# Altium PCB MainBoardPCB_PWR.PcbDoc (part 1 of 29)
Units mm, origin at the board's own origin, x right, y up, seen from the top; angles counter-clockwise.
Board outline 333.63 x 349.38 mm, 16 copper layers (L1, L2 (GND), L3 (Sign), L4 (GND), L5 (Sign), L6 (PWR/GND), L7(PWR/GND), L8 (PWR/GND), L9 (PWR/GND), L10 (PWR/GND), L11 (PWR/GND), L12 (Sign), L13 (GND), L14 (Sign), L15 (GND), L16), stack 2.503 mm thick; 2187 components, 1615 nets, 7987 pads, 1695 vias.
Unrouted connection lines stored in the file: 4757.
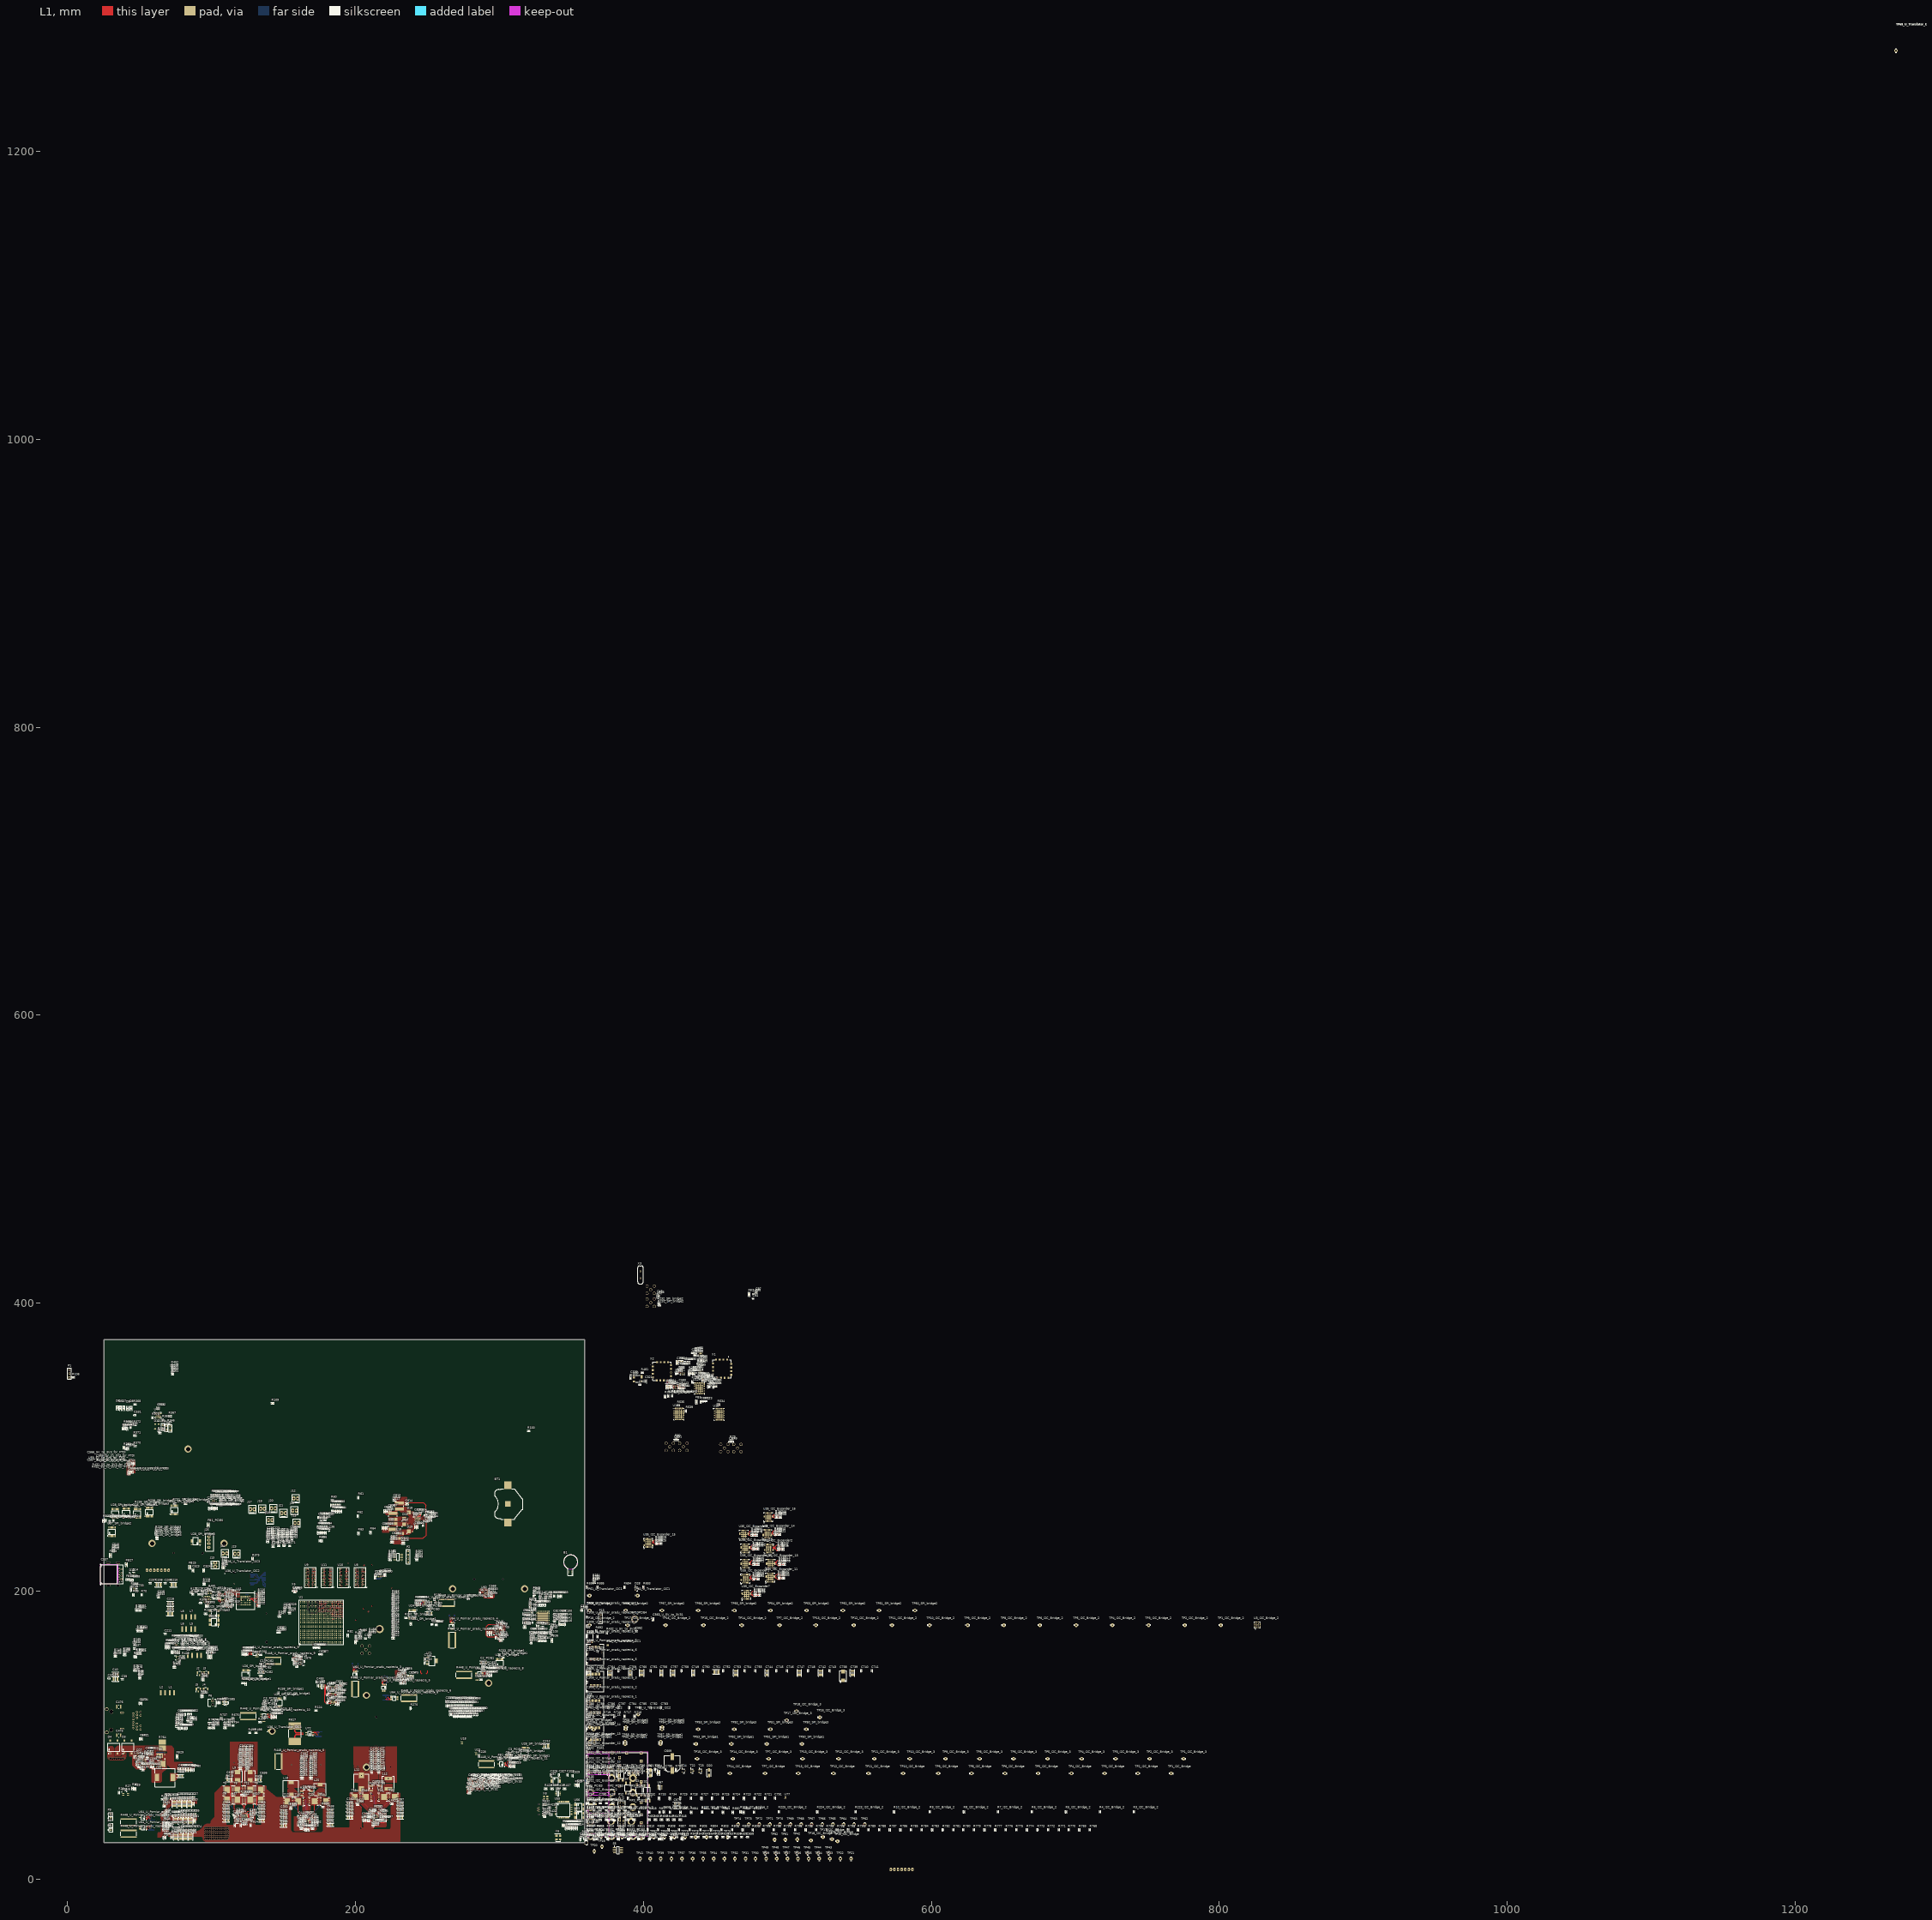
[diagram p0: L1 view]
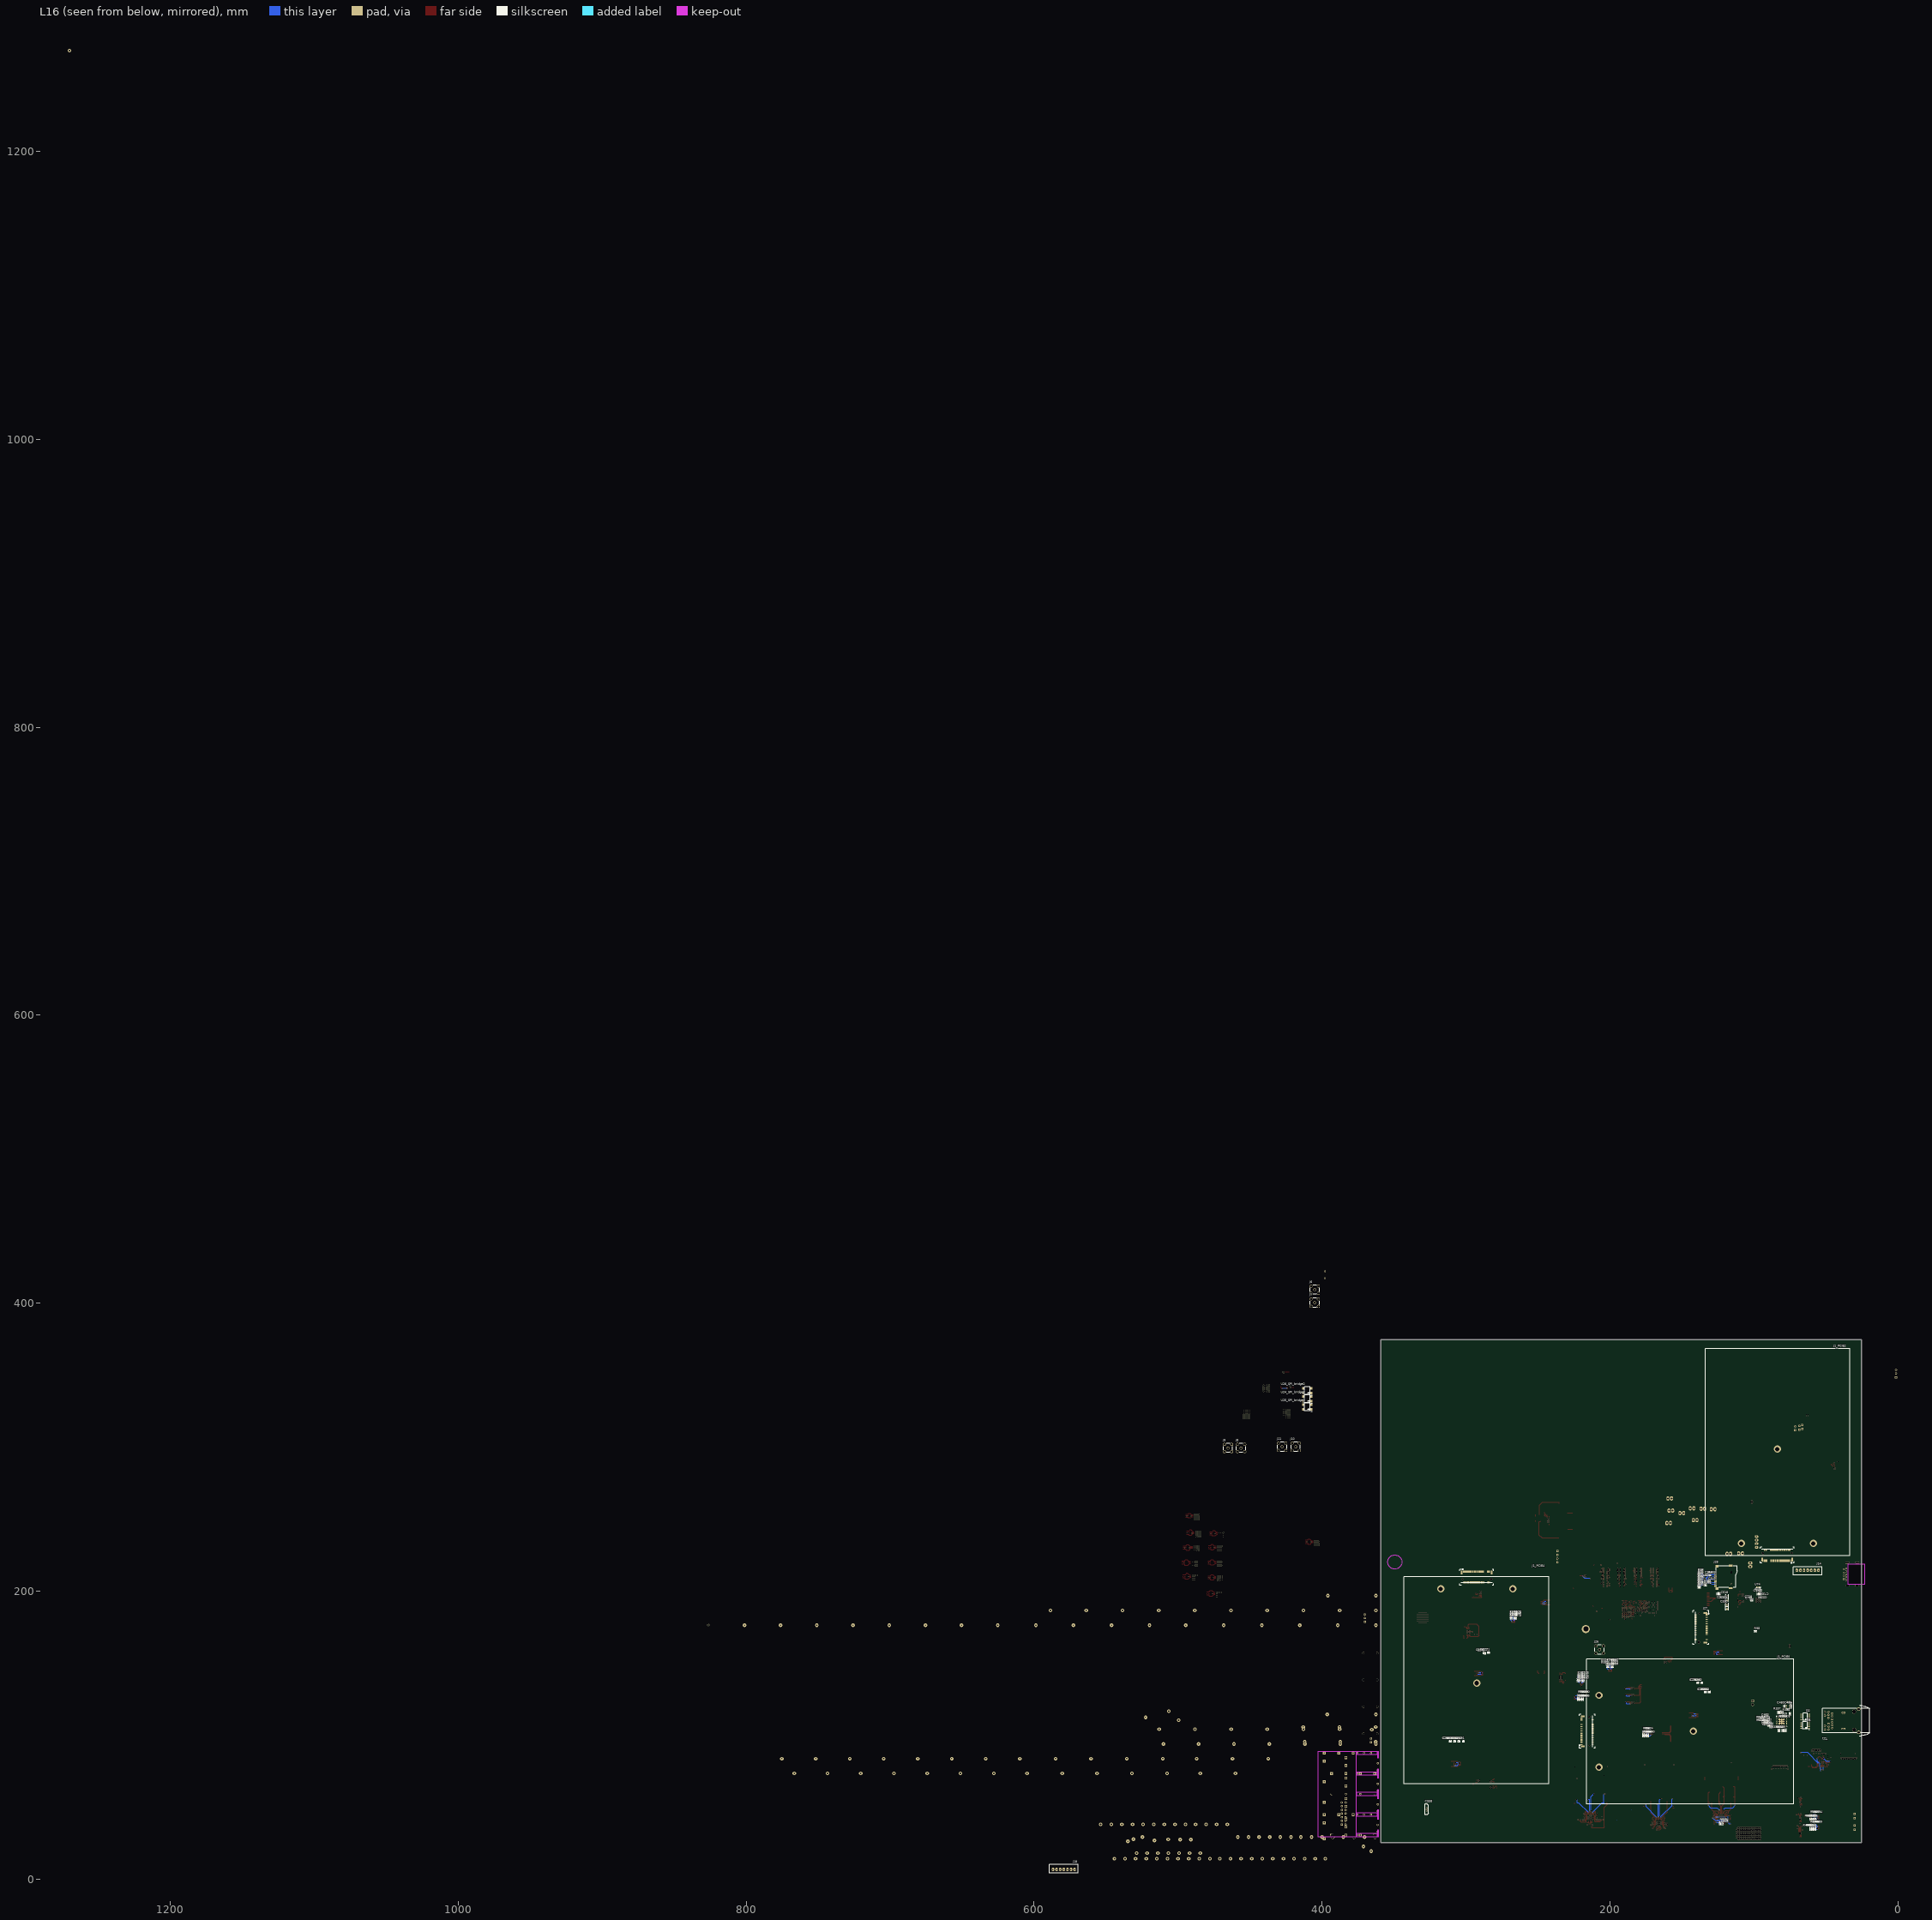
[diagram p1: L16 view, seen from below]
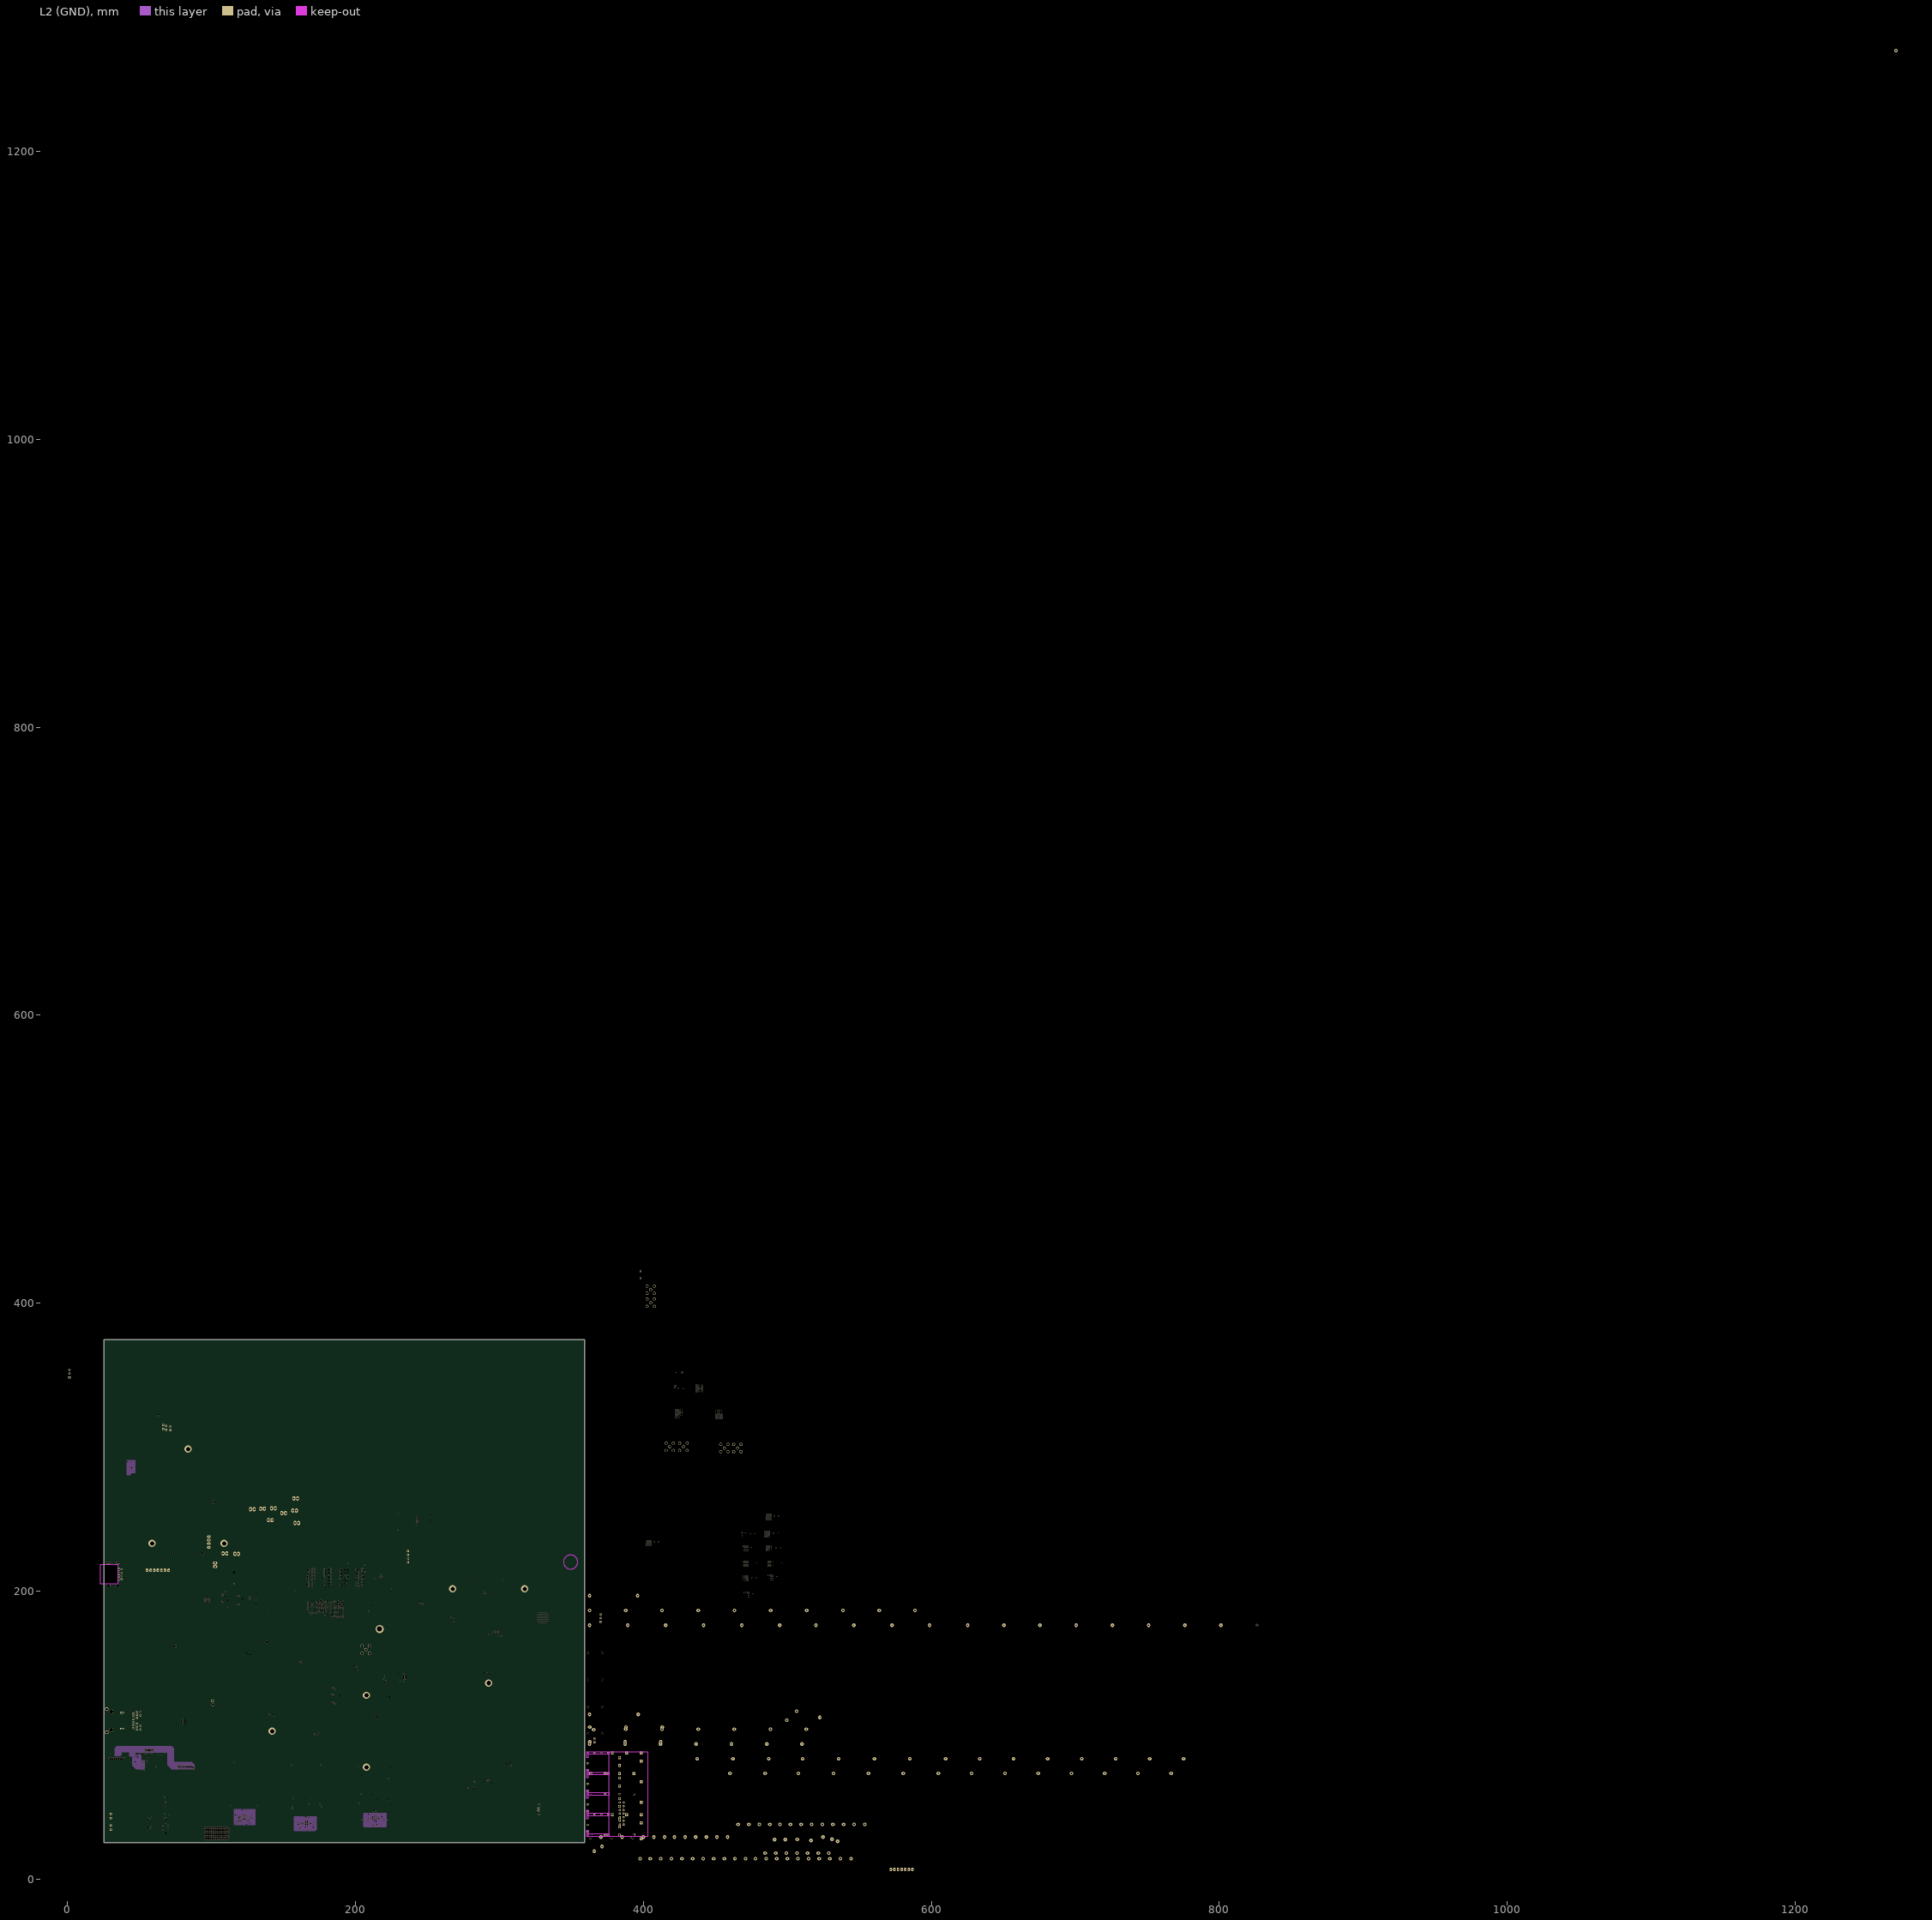
[diagram p2: L2 (GND)]
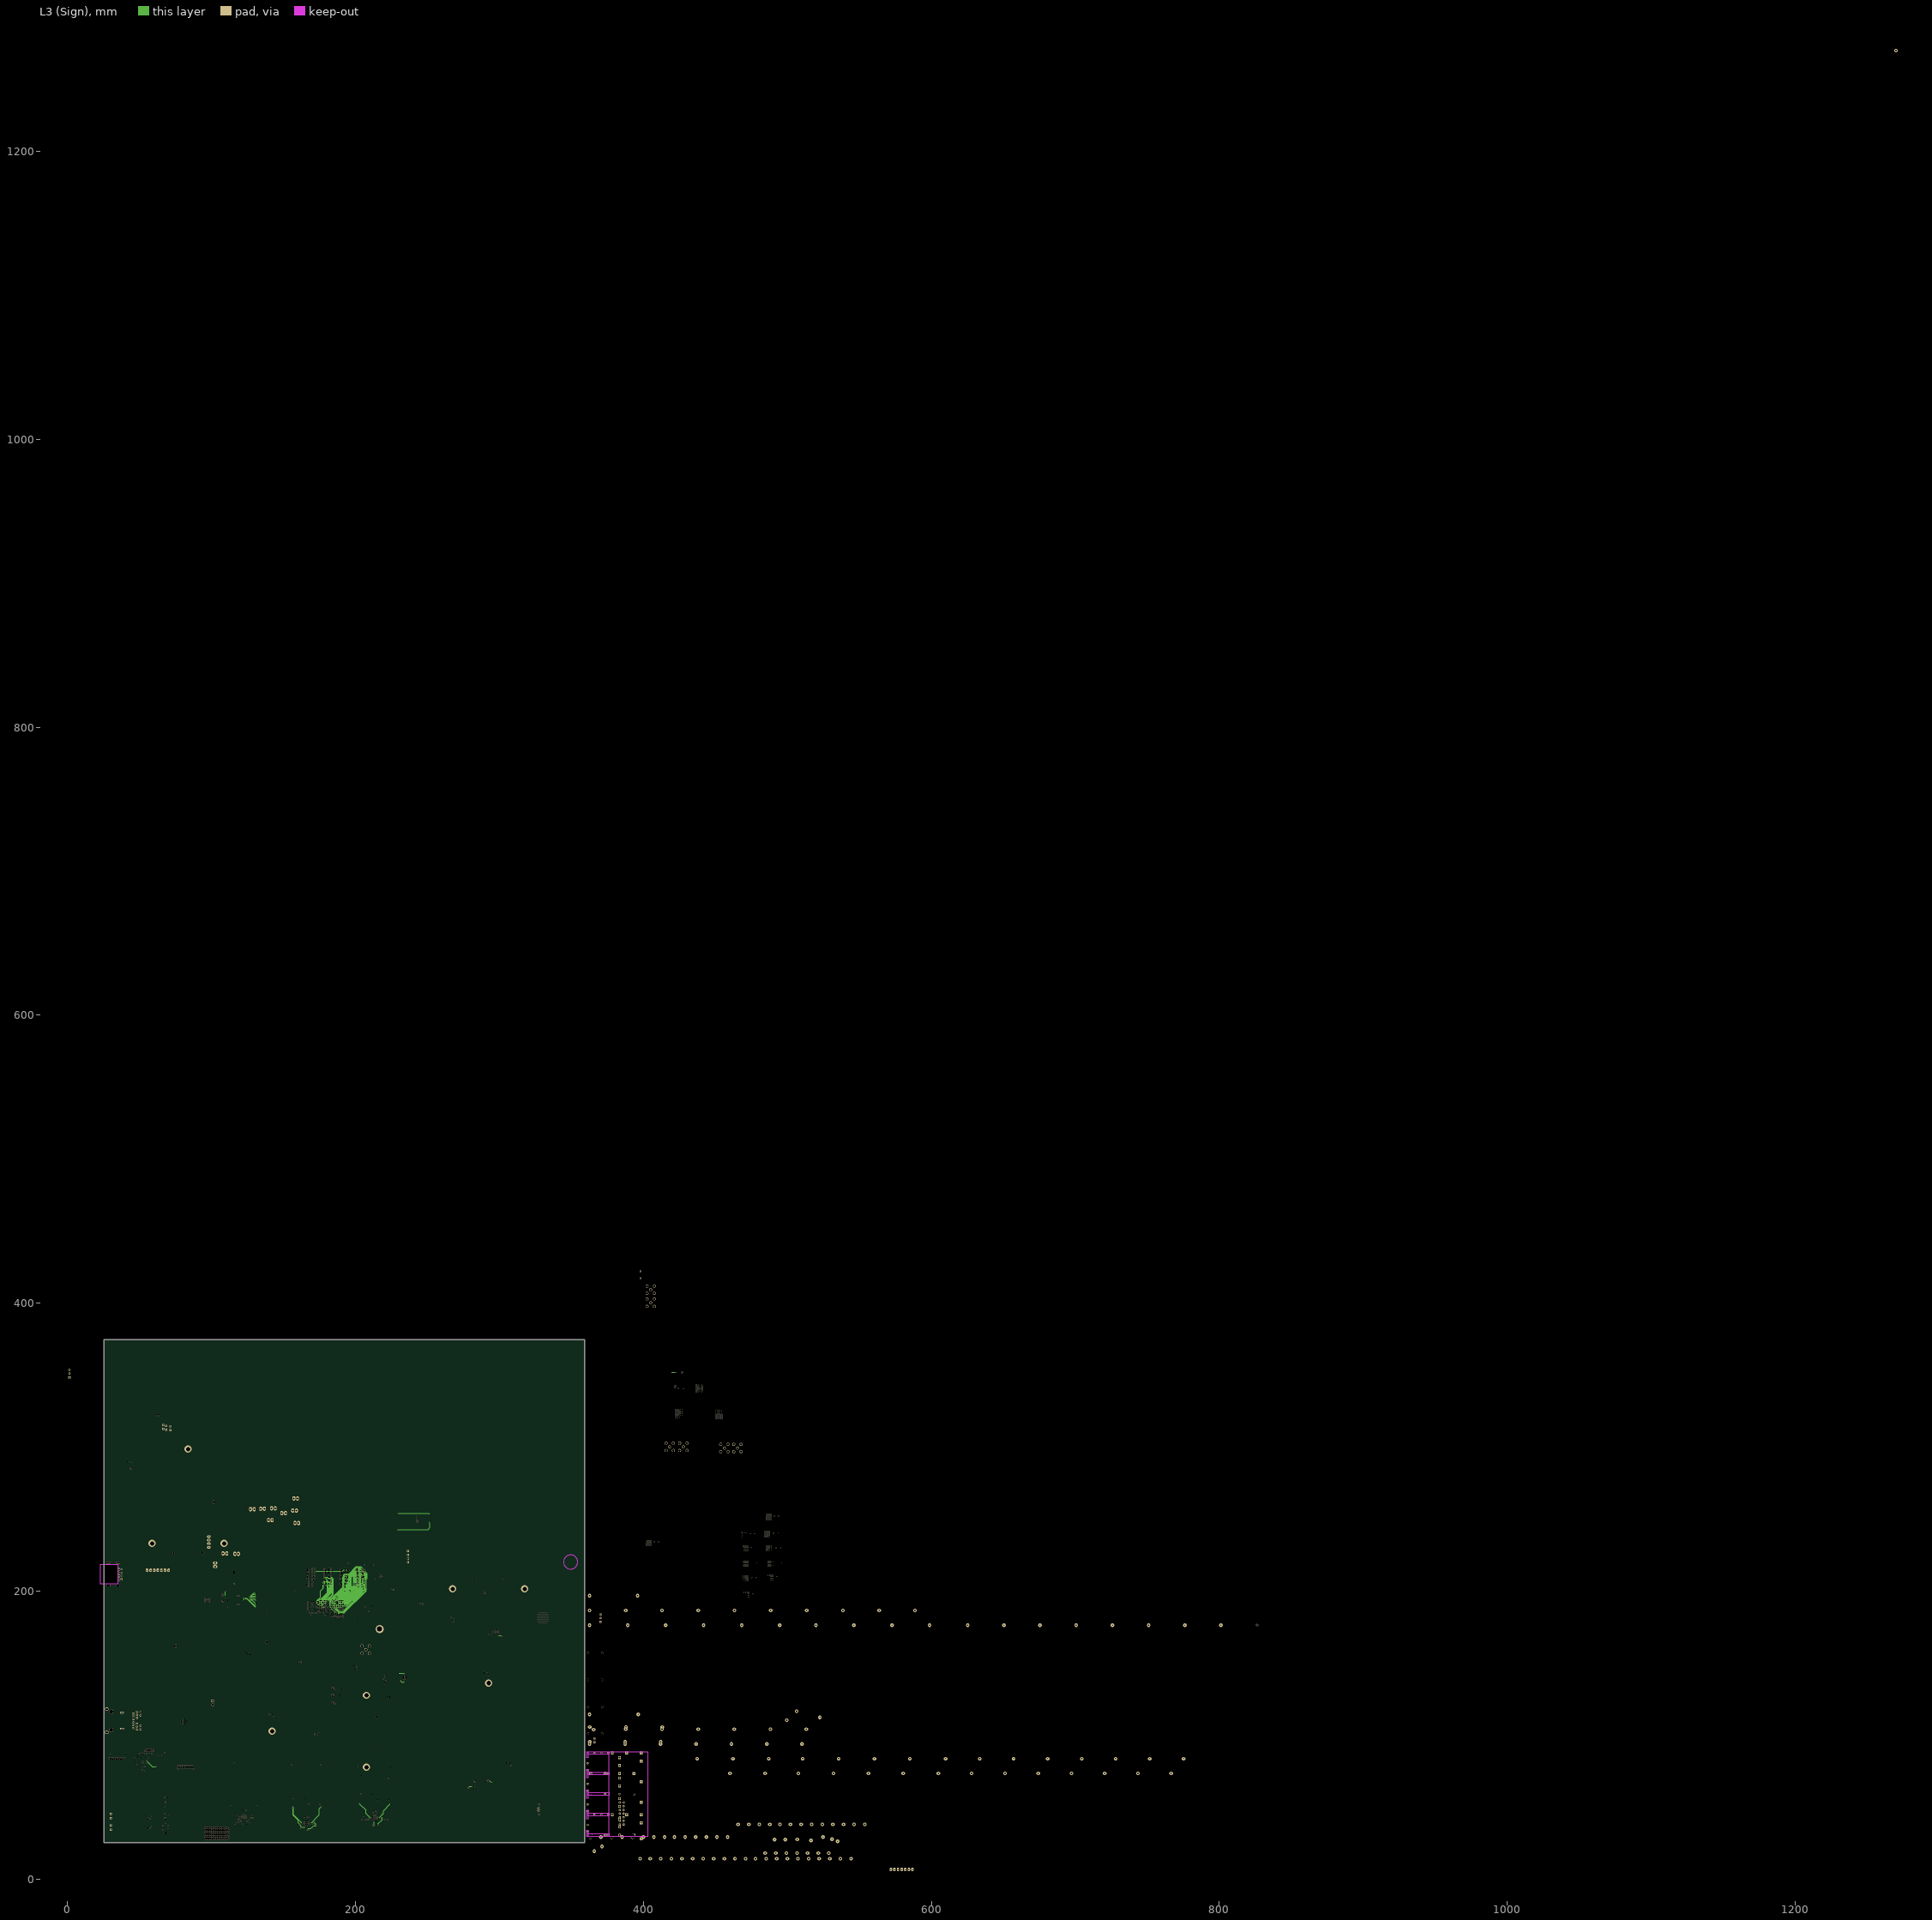
[diagram p3: L3 (Sign)]
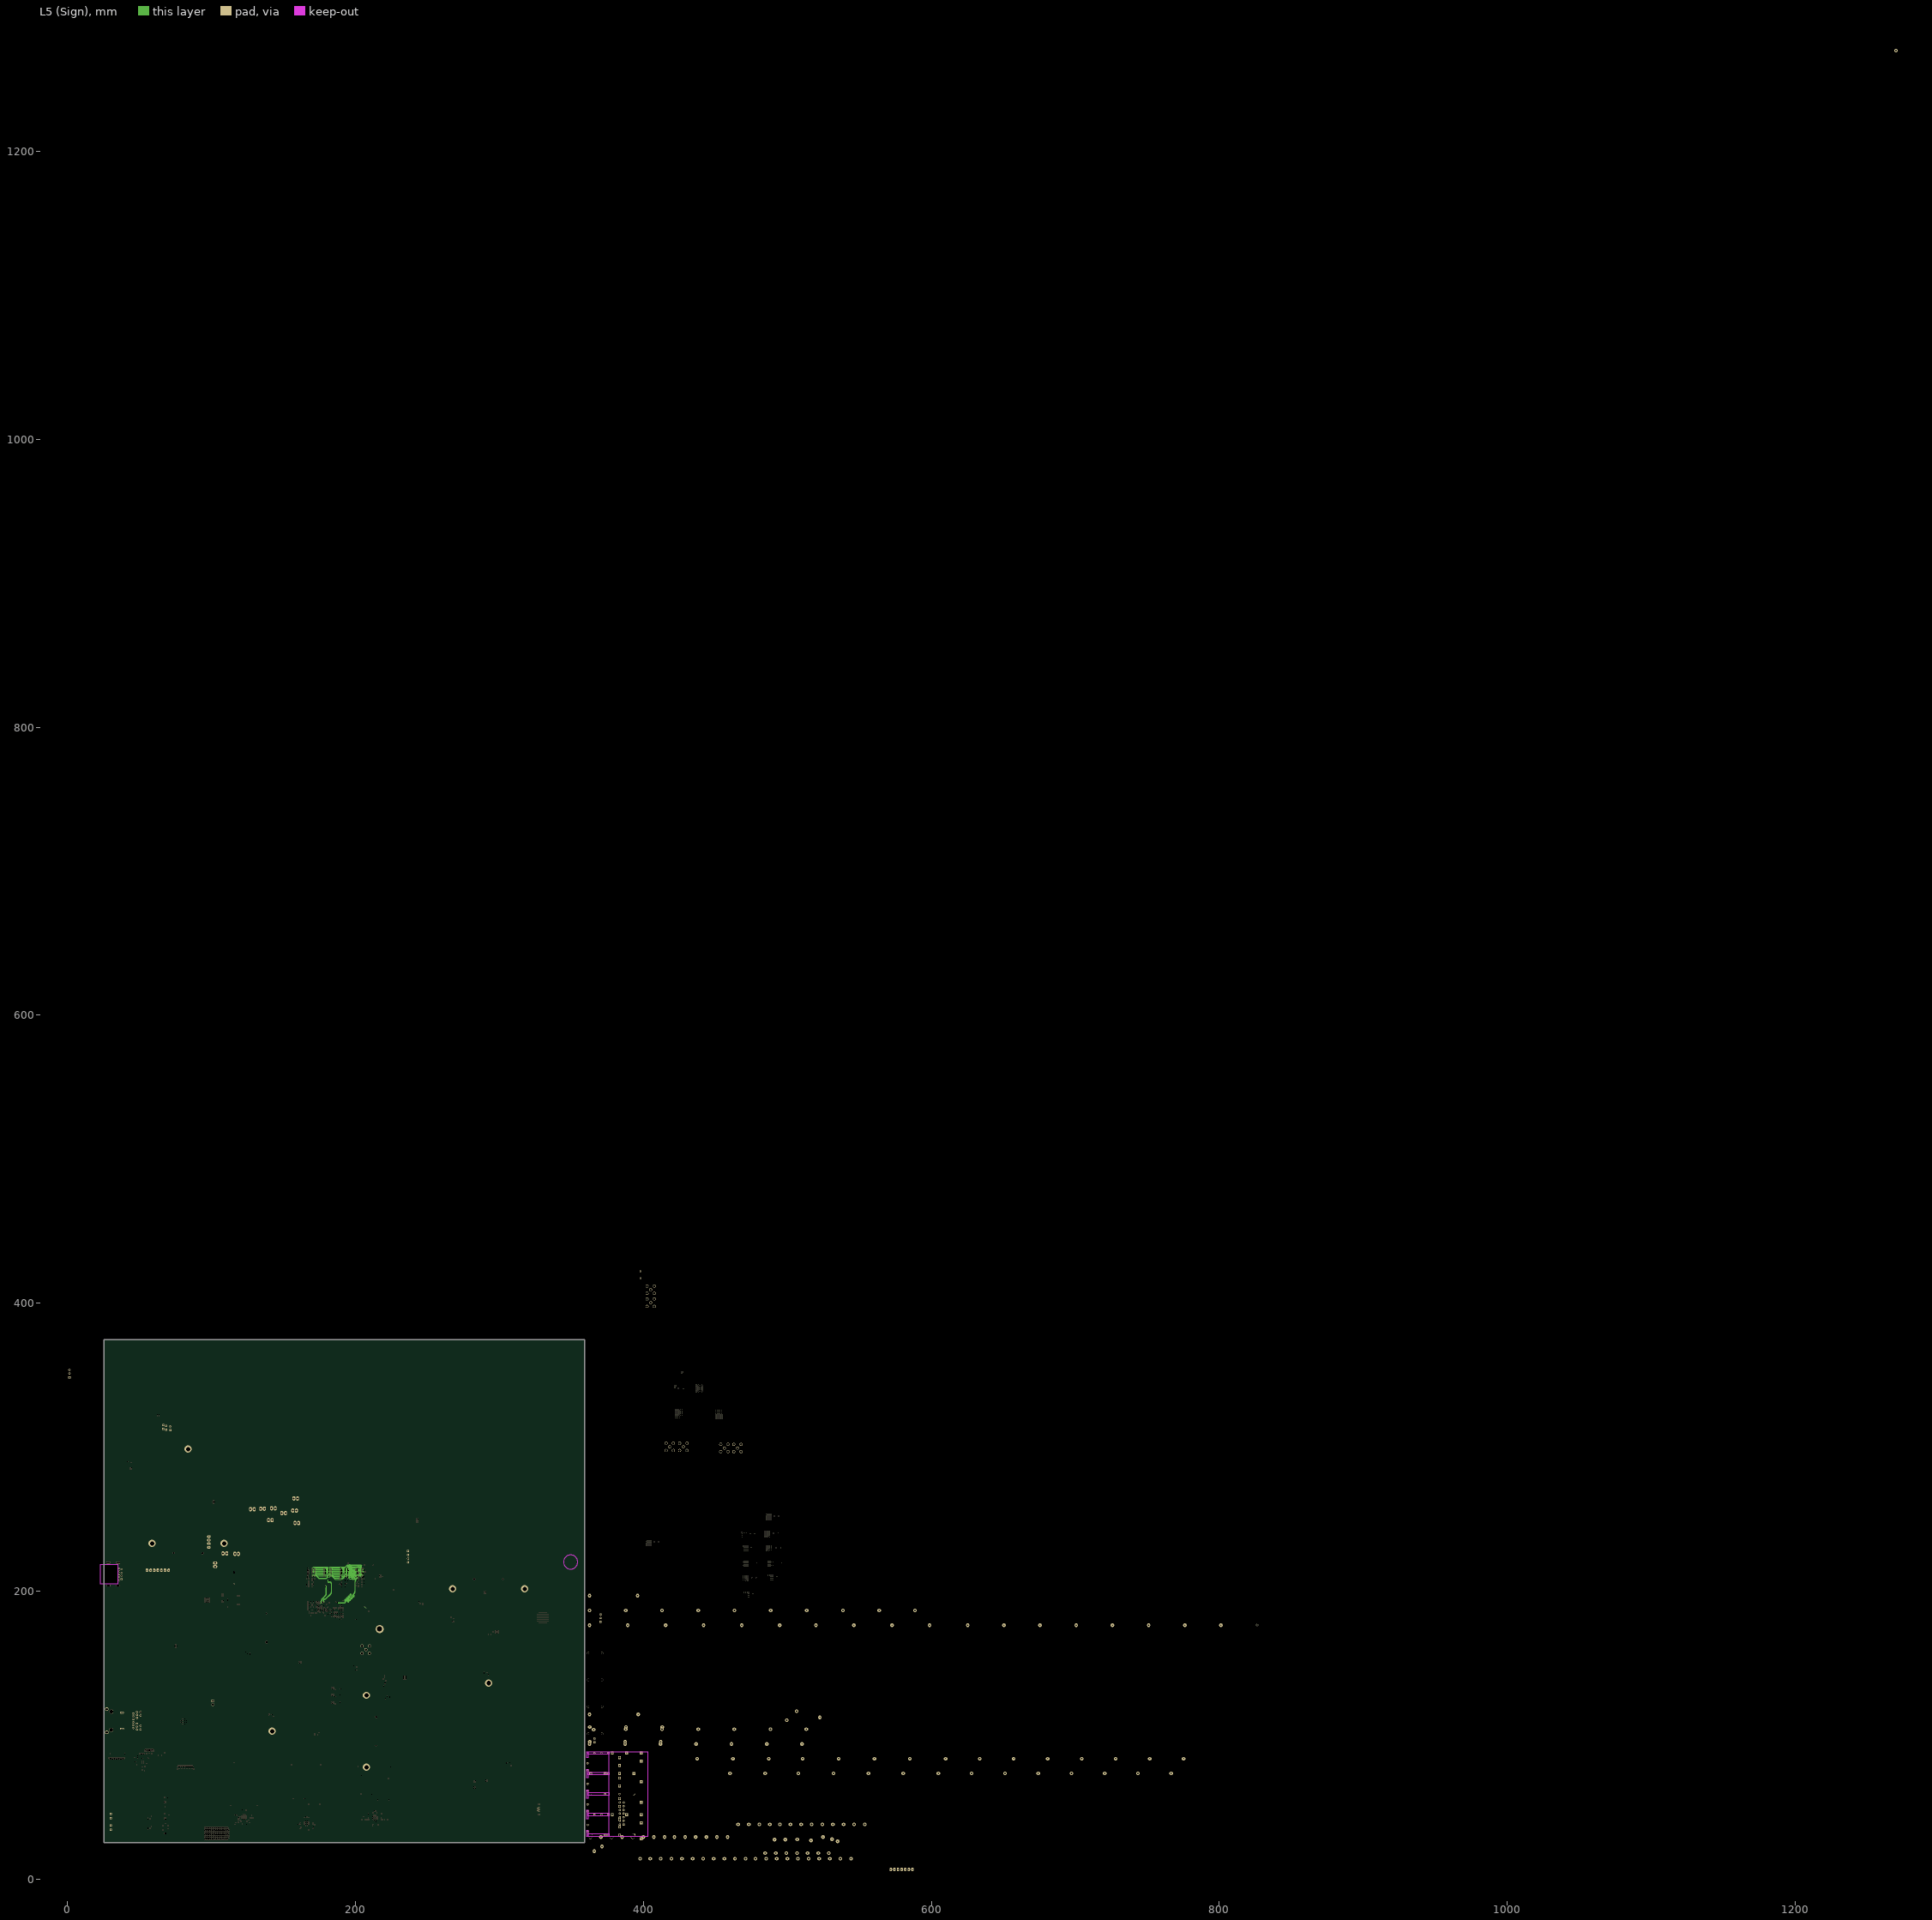
[diagram p4: L5 (Sign)]
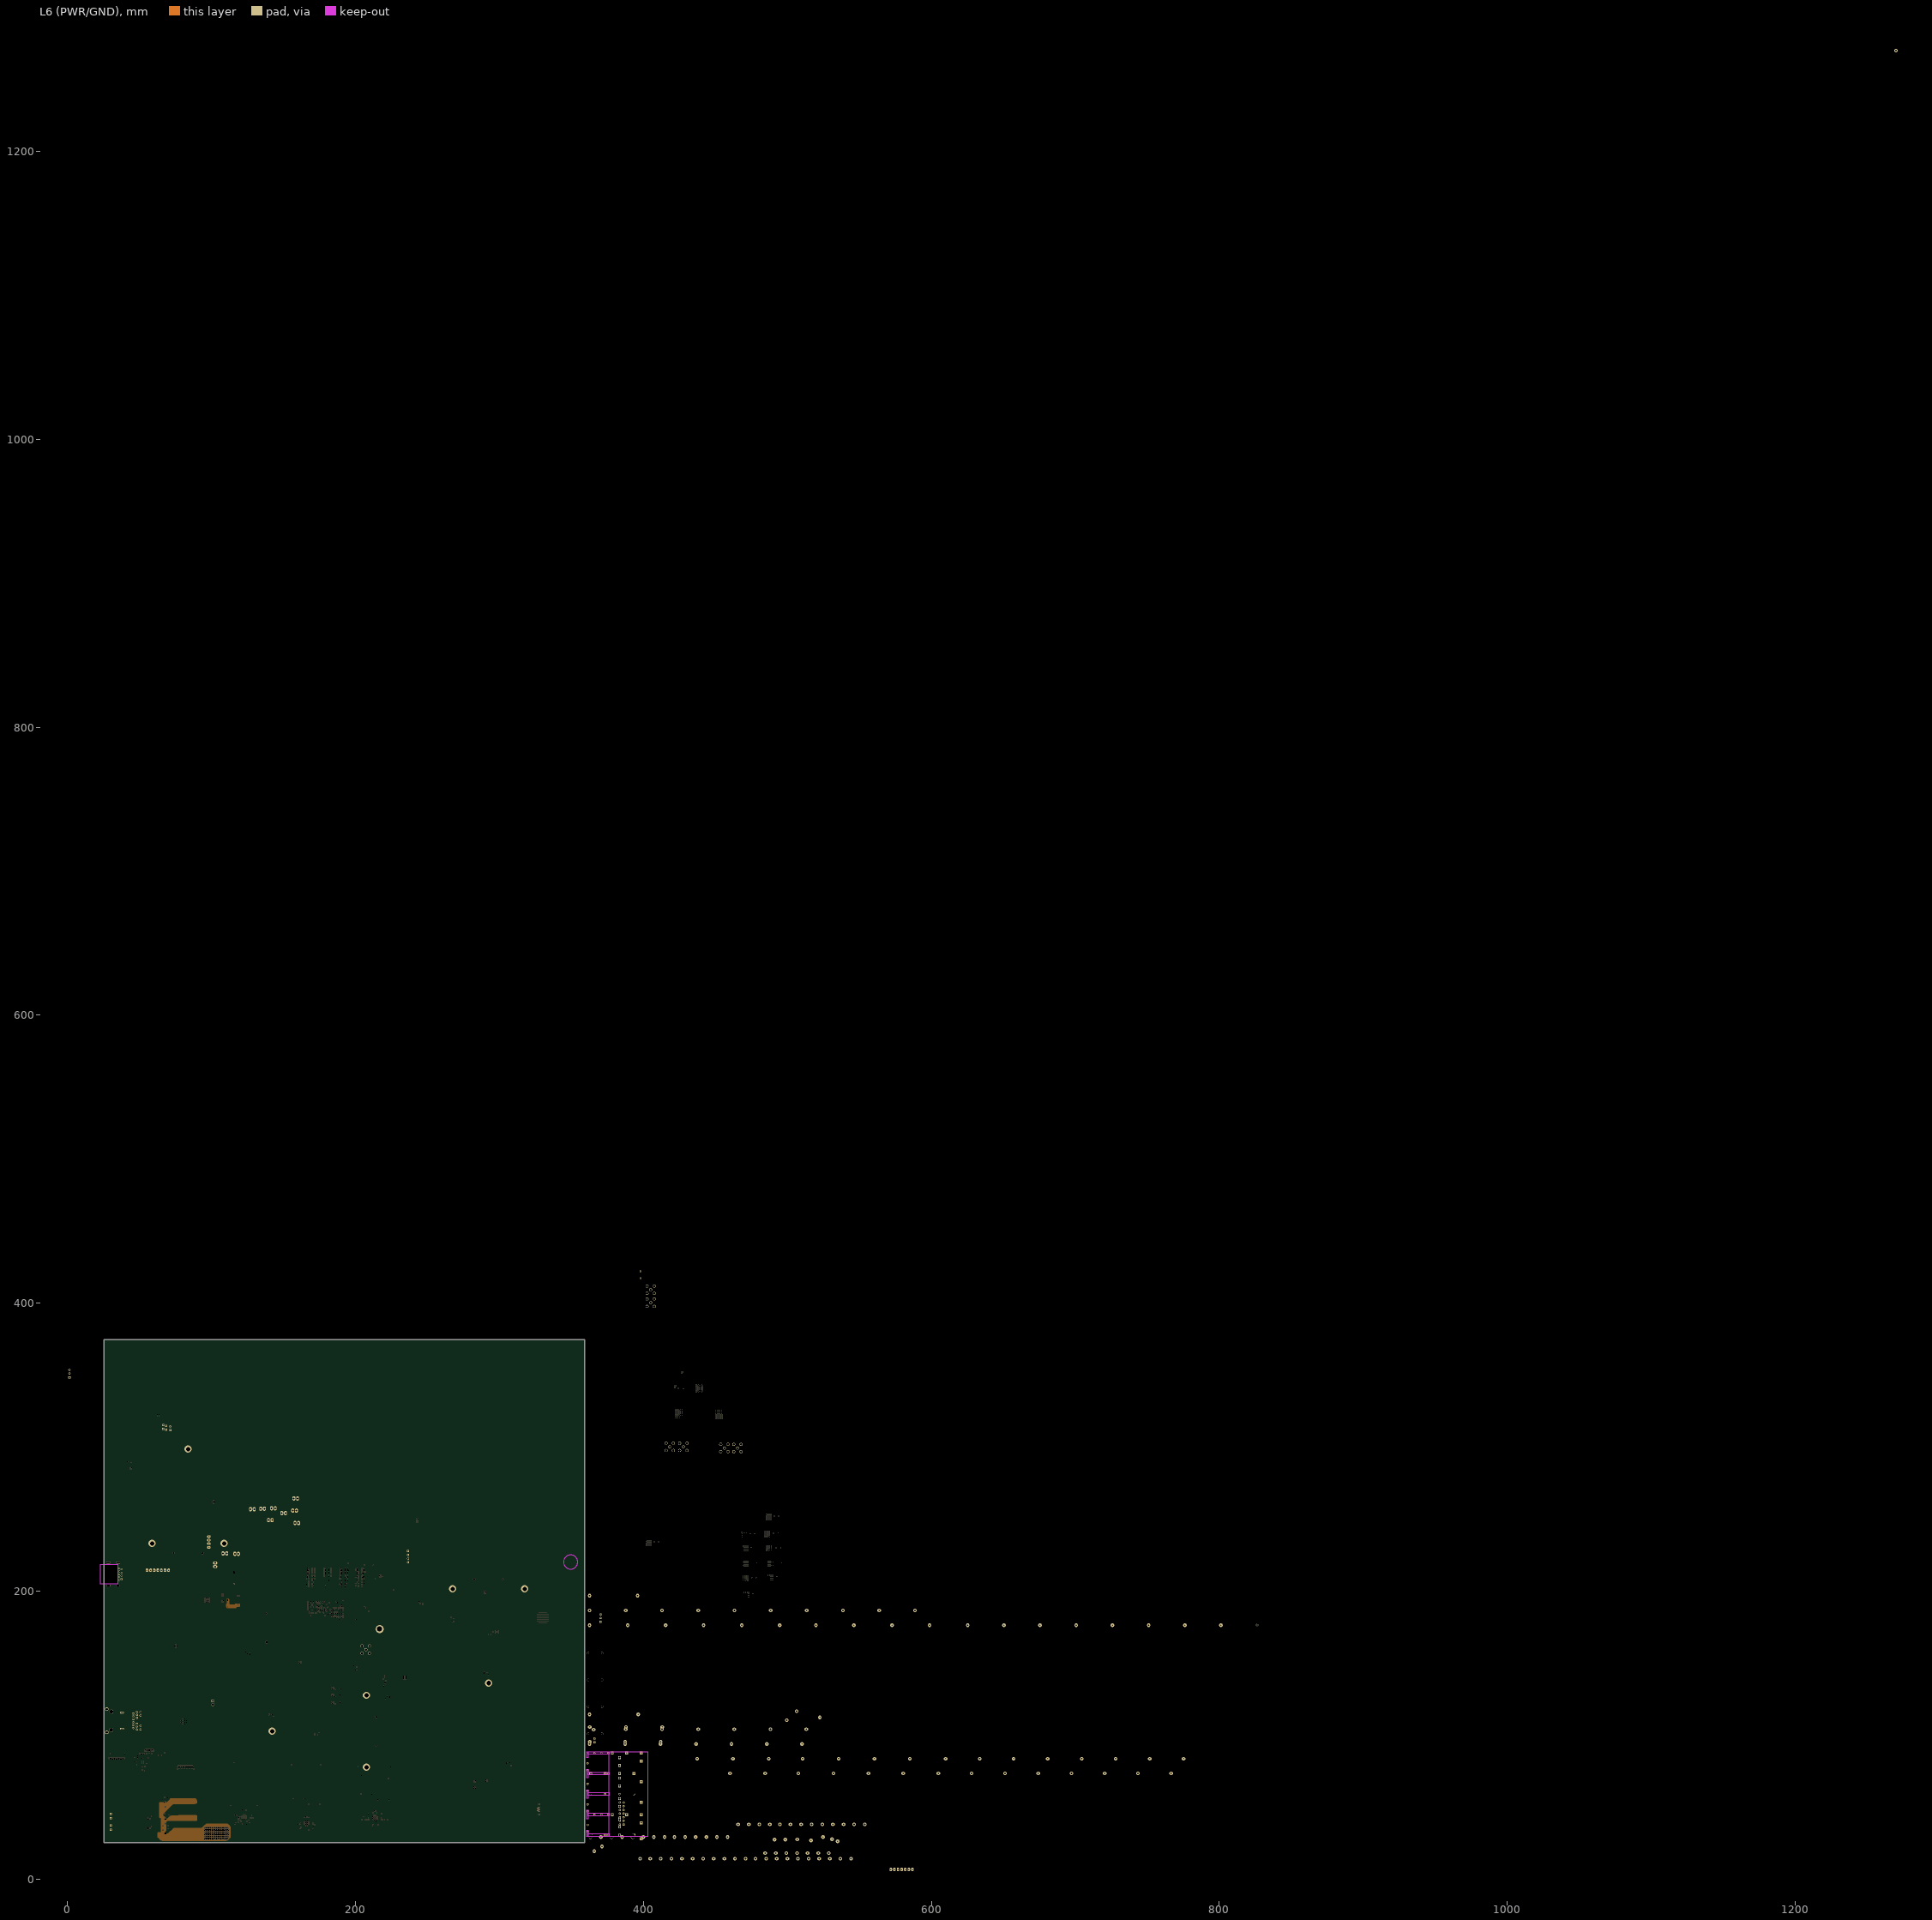
[diagram p5: L6 (PWR/GND)]
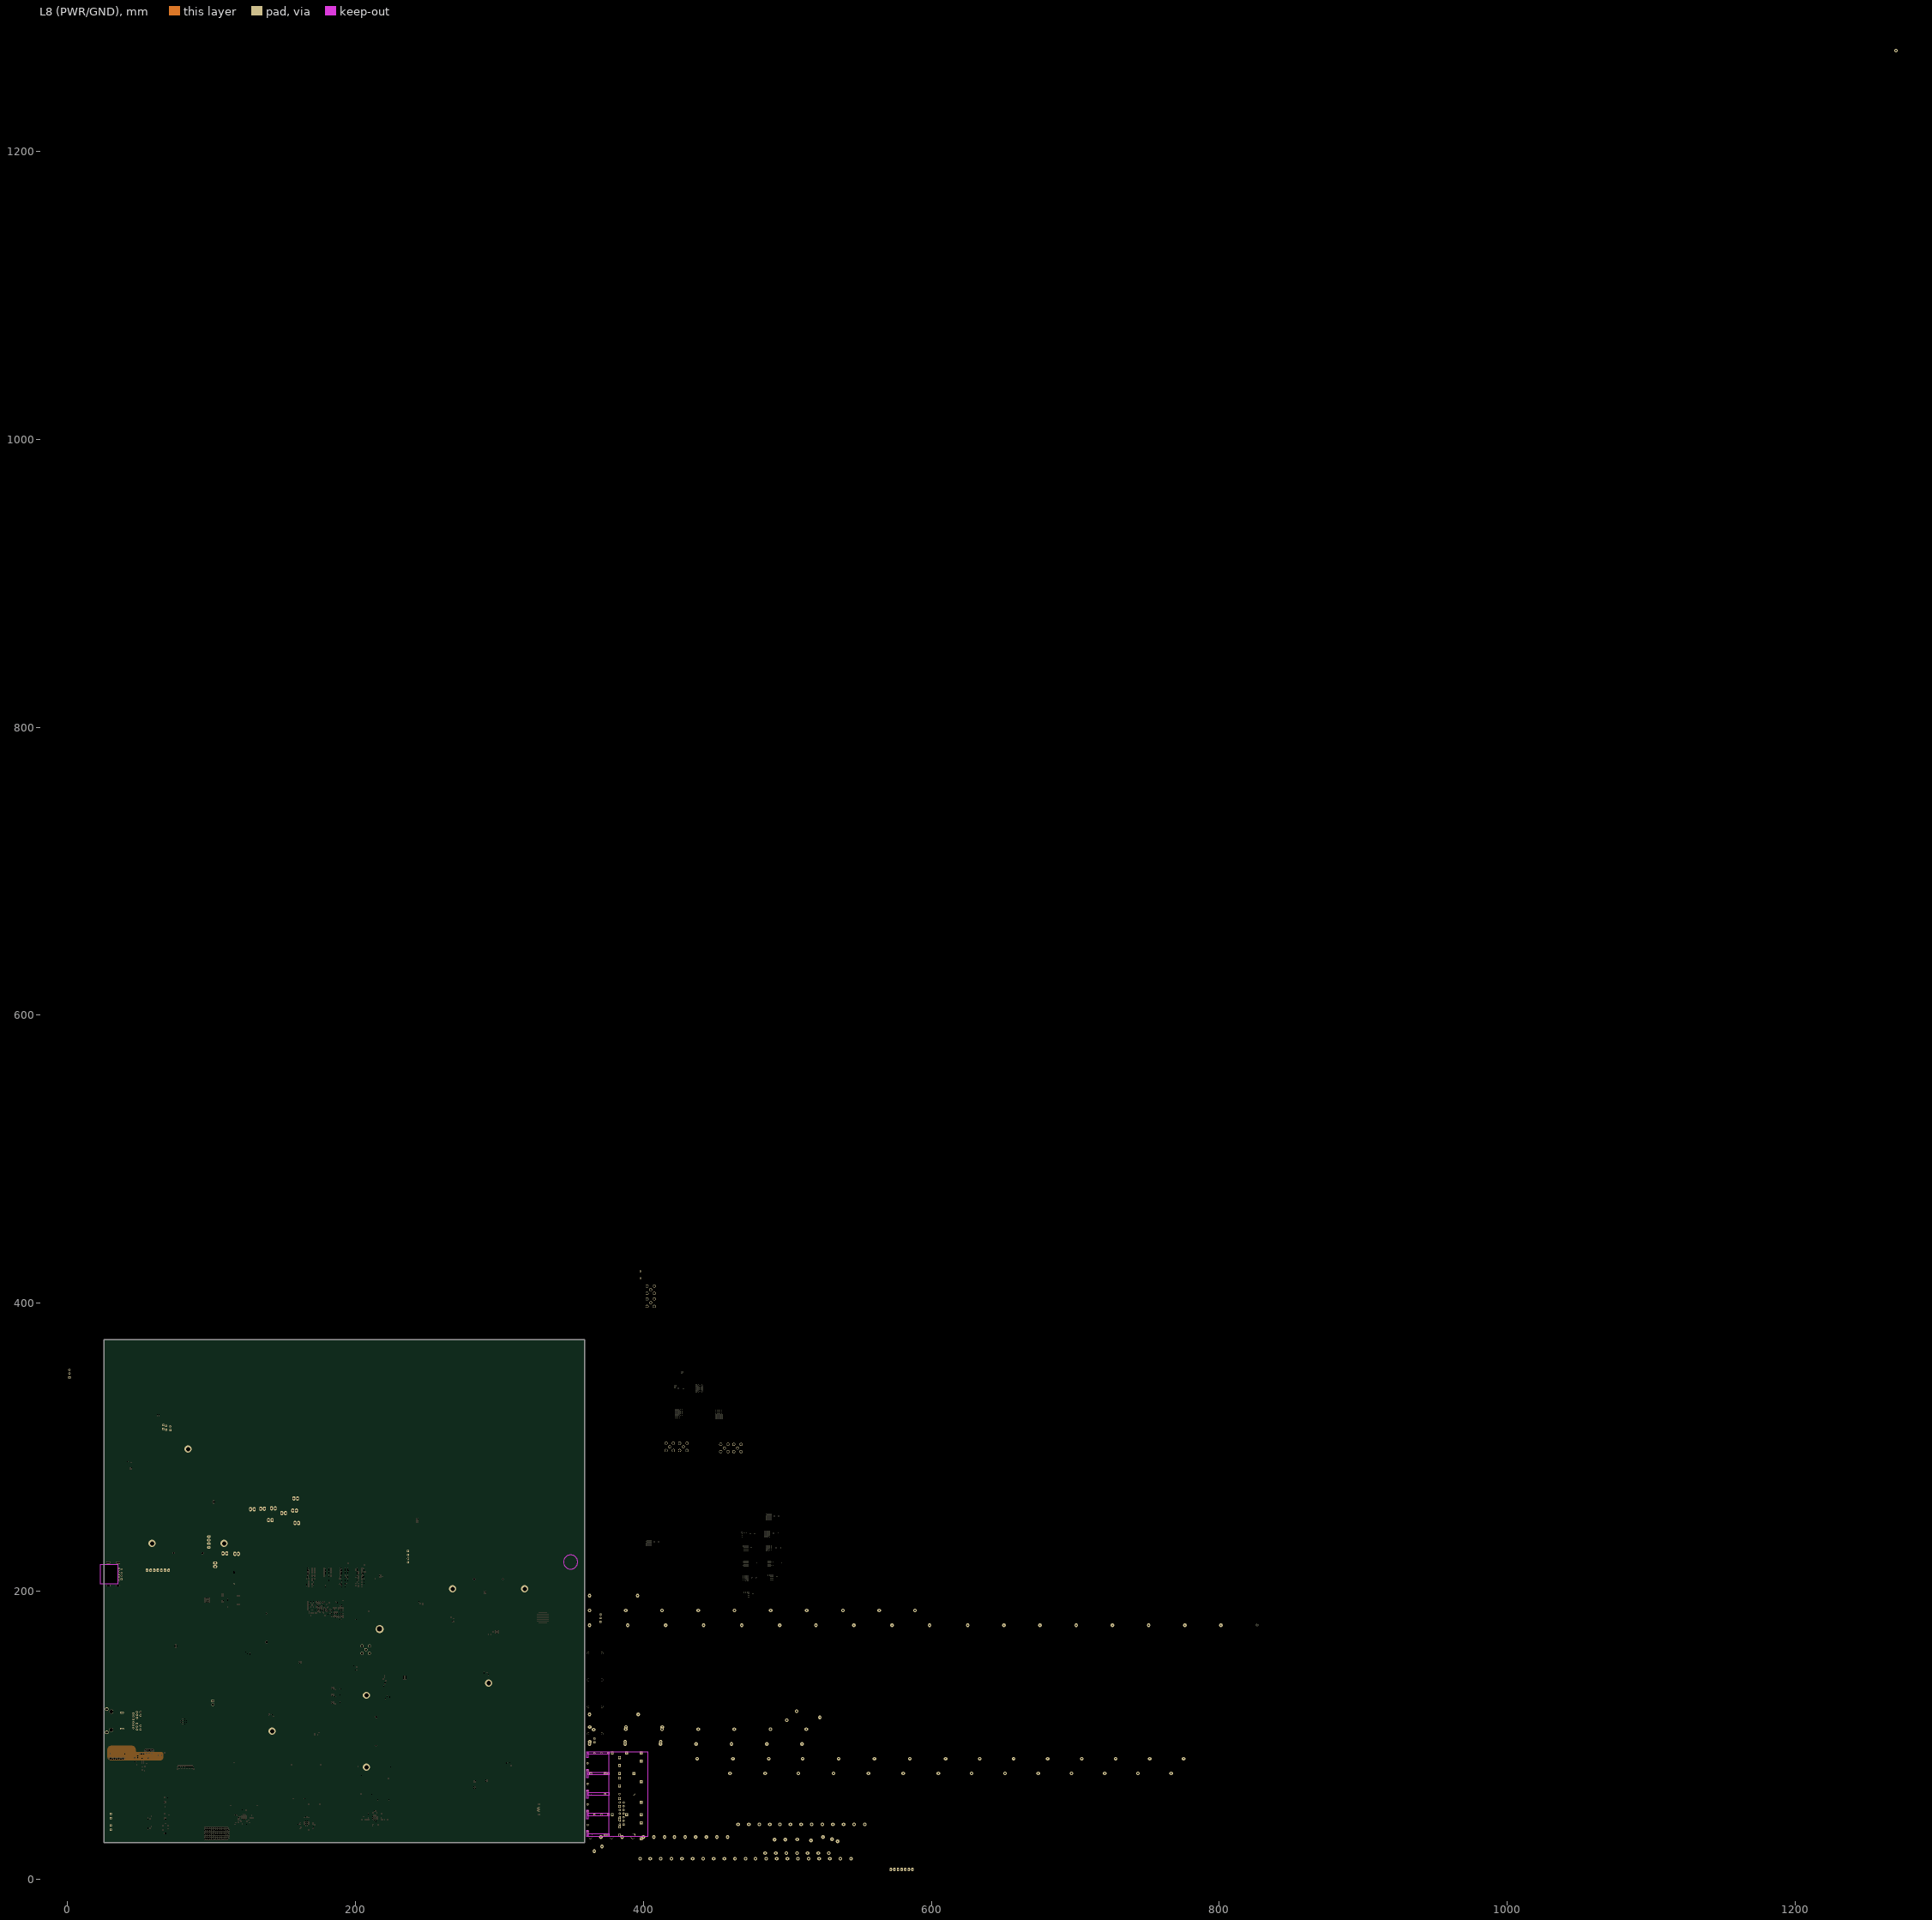
[diagram p6: L8 (PWR/GND)]
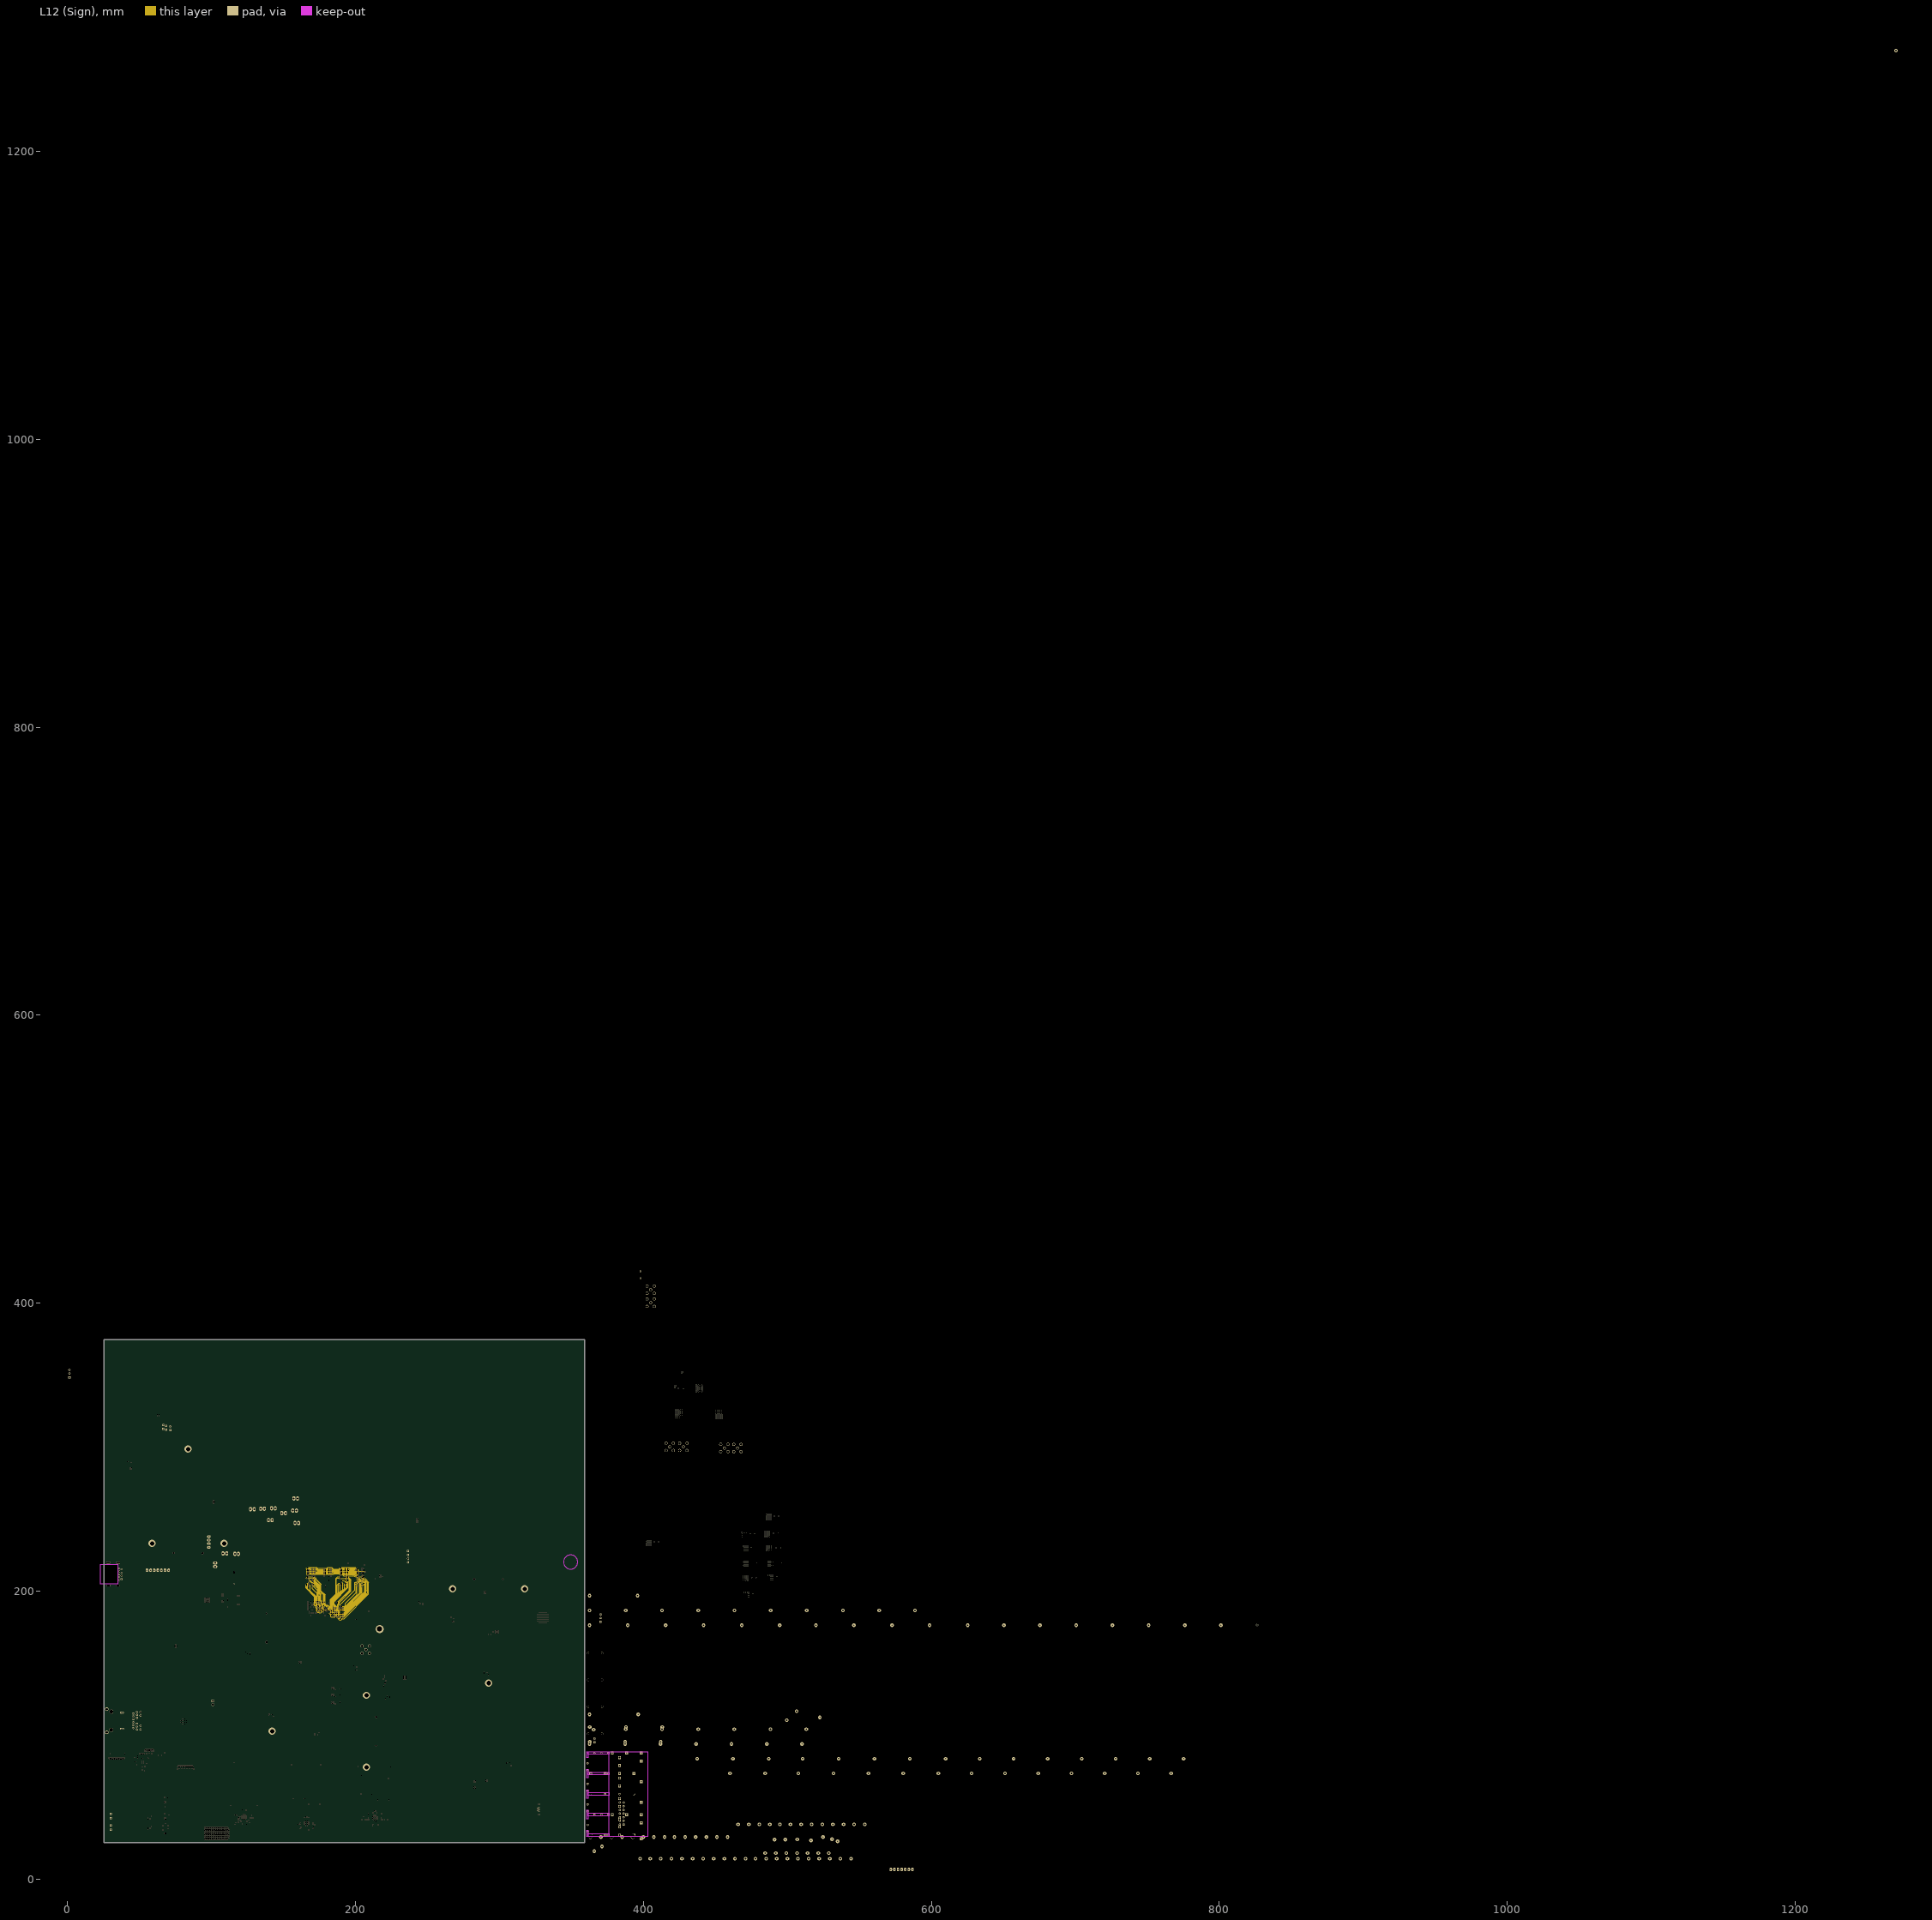
[diagram p7: L12 (Sign)]
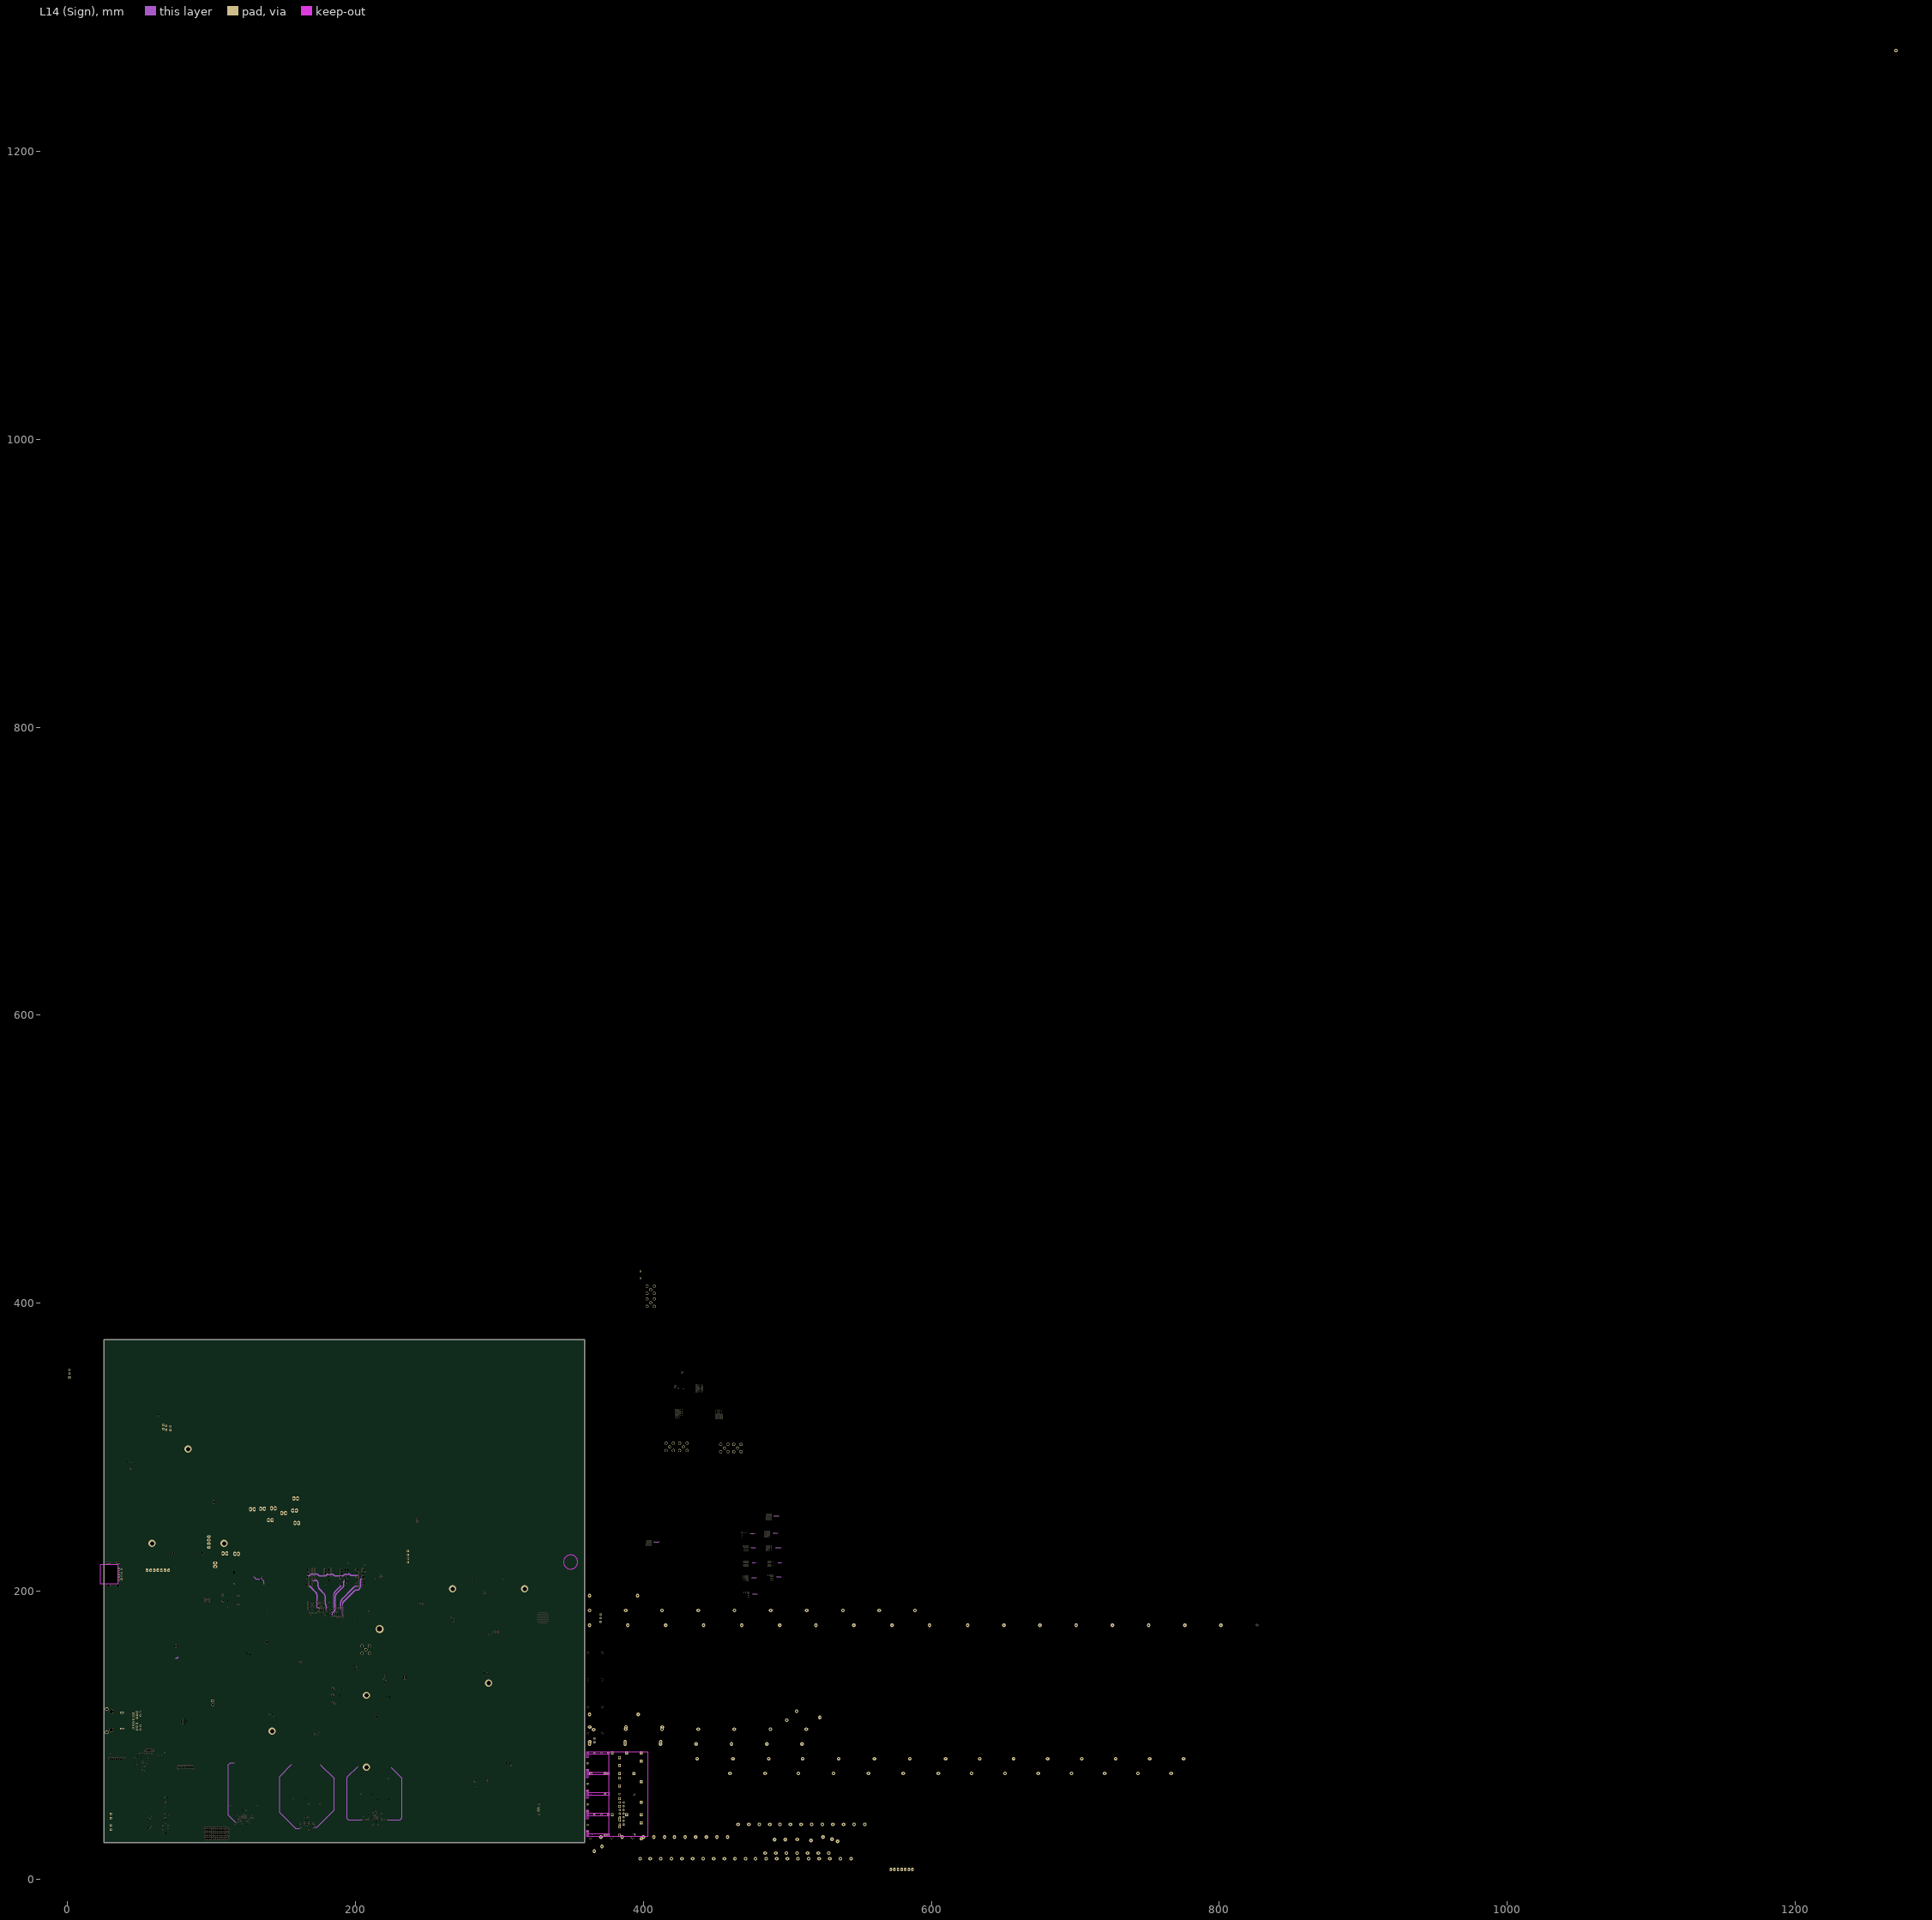
[diagram p8: L14 (Sign)]

## Layer stack, top to bottom
Top Solder: solder mask 0.025, SM-001, Dk 4
L1: signal copper 0.064
Dielectric 1: prepreg 0.074, PP-013, Dk 4.3
L2 (GND): signal copper 0.015
Dielectric 2: core 0.114, Core-001, Dk 4.1
L3 (Sign): signal copper 0.015
Dielectric 3: prepreg 0.114, PP-013, Dk 4.3
L4 (GND): signal copper 0.015
Dielectric 4: core 0.114, Core-001, Dk 4.1
L5 (Sign): signal copper 0.015
Dielectric 5: prepreg 0.114, PP-013, Dk 4.3
L6 (PWR/GND): signal copper 0.03
Dielectric 6: core 0.203, Core-001, Dk 4.1
L7(PWR/GND): signal copper 0.03
Dielectric 7: prepreg 0.203, PP-013, Dk 4.3
L8 (PWR/GND): signal copper 0.03
Dielectric 8: core 0.203, Core-001, Dk 4.1
L9 (PWR/GND): signal copper 0.03
Dielectric 9: prepreg 0.203, PP-013, Dk 4.3
L10 (PWR/GND): signal copper 0.03
Dielectric 10: core 0.203, Core-001, Dk 4.1
L11 (PWR/GND): signal copper 0.03
Dielectric 11: prepreg 0.114, PP-013, Dk 4.3
L12 (Sign): signal copper 0.015
Dielectric 12: core 0.114, Core-001, Dk 4.1
L13 (GND): signal copper 0.015
Dielectric 13: prepreg 0.114, PP-013, Dk 4.3
L14 (Sign): signal copper 0.015
Dielectric 14: core 0.114, Core-001, Dk 4.1
L15 (GND): signal copper 0.015
Dielectric 15: prepreg 0.074, PP-013, Dk 4.3
L16: signal copper 0.064
Bottom Solder: solder mask 0.025, SM-001, Dk 4

## Board outline
25.4,25.4 359.029,25.4 359.029,374.777 25.4,374.777

## Design rules (kind name [scope] priority, off if disabled: settings)
BackDrilling [(InNetClass('RAM_Adress') Or InNetClass('RAM_Data_IO') Or InNetClass('RAM_Clock_Signal') Or InNetClass('RAM_DQS_Strobe'))  And IsVia] p1: maxstublength=0.381 usetopbackdrill=TRUE usebottombackdrill=TRUE holeoversize=0.025 holetolplus=0 holetolminus=0
BoardOutlineClearance [All] p1: gap=0.254 ignorepadtopadclearanceinfootprint=FALSE except(0: Arc-SplitContinuation Track-SplitContinuation SMDPad-SplitContinuation THPad-SplitContinuation Via-SplitContinuation Fill-SplitContinuation Poly-SplitContinuation Region-SplitContinuation Text-SplitContinuation)
Clearance "RAM_Addr to RAM_Addr" [InNetClass('Single_36_39_50_Adr') vs InNetClass('Single_36_39_50_Adr')] p1: gap=0.1 ignorepadtopadclearanceinfootprint=FALSE
Clearance "RAM_Addr to other" [InNetClass('Single_36_39_50_Adr')] p2: gap=0.15 ignorepadtopadclearanceinfootprint=TRUE
Clearance [All] p3: gap=0.1 ignorepadtopadclearanceinfootprint=FALSE
DiffPairsRouting RAM_DQS [InDifferentialPairClass('Diff_76_to_90_Ram_DQS')] p1: maxlimit=0.254 minlimit=0.127 mostfreqgap=0.254 toplayer_maxgap=0.127 toplayer_prefgap=0.127 toplayer_minwidth=0.123 toplayer_maxwidth=0.159 toplayer_prefwidth=0.124 midlayer1_maxgap=0.127 midlayer1_prefgap=0.127 midlayer1_minwidth=0.105 midlayer1_maxwidth=0.105 midlayer1_prefwidth=0.105 midlayer2_maxgap=0.127 midlayer2_prefgap=0.127 midlayer2_minwidth=0.105 midlayer2_maxwidth=0.137 midlayer2_prefwidth=0.105 midlayer3_mingap=0.254 midlayer3_minwidth=0.381 midlayer3_maxwidth=0.381 midlayer3_prefwidth=0.381 midlayer4_mingap=0.254 midlayer4_minwidth=0.381 midlayer4_maxwidth=0.381 midlayer4_prefwidth=0.381 midlayer5_maxgap=0.127 midlayer5_prefgap=0.127 midlayer5_minwidth=0.105 midlayer5_maxwidth=0.127 midlayer5_prefwidth=0.105 midlayer6_maxgap=0.127 midlayer6_prefgap=0.127 midlayer6_minwidth=0.105 midlayer6_maxwidth=0.105 midlayer6_prefwidth=0.105 midlayer7_maxgap=0.127 midlayer7_prefgap=0.127 midlayer7_minwidth=0.084 midlayer7_maxwidth=0.084 midlayer7_prefwidth=0.084 midlayer8_maxgap=0.127 midlayer8_prefgap=0.127 midlayer8_minwidth=0.105 midlayer8_maxwidth=0.137 midlayer8_prefwidth=0.105 midlayer9_mingap=0.254 midlayer9_minwidth=0.381 midlayer9_maxwidth=0.381 midlayer9_prefwidth=0.381 midlayer10_mingap=0.254 midlayer10_minwidth=0.381 midlayer10_maxwidth=0.381 midlayer10_prefwidth=0.381 midlayer11_mingap=0.254 midlayer11_minwidth=0.381 midlayer11_maxwidth=0.381 midlayer11_prefwidth=0.381 midlayer12_mingap=0.254 midlayer12_minwidth=0.381 midlayer12_maxwidth=0.381 midlayer12_prefwidth=0.381 midlayer13_maxgap=0.127 midlayer13_prefgap=0.127 midlayer13_minwidth=0.105 midlayer13_maxwidth=0.137 midlayer13_prefwidth=0.105 midlayer14_maxgap=0.127 midlayer14_prefgap=0.127 midlayer14_minwidth=0.084 midlayer14_maxwidth=0.102 midlayer14_prefwidth=0.084 bottomlayer_maxgap=0.127 bottomlayer_prefgap=0.127 bottomlayer_minwidth=0.123 bottomlayer_maxwidth=0.159 bottomlayer_prefwidth=0.124 maxuncoupledlength=12.7
DiffPairsRouting RAM_Diff_76_86_90_Addr [InDifferentialPairClass('Diff_76_to_90_Ram_CLK')] p2: maxlimit=0.31 minlimit=0.111 mostfreqgap=0.254 toplayer_mingap=0.154 toplayer_prefgap=0.192 toplayer_minwidth=0.1 toplayer_maxwidth=0.12 toplayer_prefwidth=0.1 midlayer2_maxgap=0.262 midlayer2_prefgap=0.111 midlayer2_minwidth=0.1 midlayer2_maxwidth=0.12 midlayer2_prefwidth=0.1 midlayer5_maxgap=0.262 midlayer5_prefgap=0.111 midlayer5_minwidth=0.1 midlayer5_maxwidth=0.12 midlayer5_prefwidth=0.1 midlayer8_maxgap=0.262 midlayer8_prefgap=0.111 midlayer8_minwidth=0.1 midlayer8_maxwidth=0.12 midlayer8_prefwidth=0.1 midlayer13_maxgap=0.262 midlayer13_prefgap=0.111 midlayer13_minwidth=0.1 midlayer13_maxwidth=0.12 midlayer13_prefwidth=0.1 bottomlayer_mingap=0.154 bottomlayer_prefgap=0.192 bottomlayer_minwidth=0.1 bottomlayer_maxwidth=0.12 bottomlayer_prefwidth=0.1 impedanceprofiledriven=TRUE impedanceprofileid={1AFD27EA-460E-472B-BC44-4C5C59E93A8B} maxuncoupledlength=0.2 // Differential pair 86 Ohm
DiffPairsRouting Diff100 [InDifferentialPairClass('Diff_100')] p3: maxlimit=0.254 minlimit=0.127 mostfreqgap=0.254 toplayer_maxgap=0.127 toplayer_prefgap=0.127 toplayer_minwidth=0.045 toplayer_maxwidth=0.088 toplayer_prefwidth=0.045 midlayer1_maxgap=0.127 midlayer1_prefgap=0.127 midlayer1_minwidth=0.072 midlayer1_maxwidth=0.073 midlayer1_prefwidth=0.073 midlayer2_maxgap=0.127 midlayer2_prefgap=0.127 midlayer2_minwidth=0.072 midlayer2_maxwidth=0.073 midlayer2_prefwidth=0.073 midlayer5_maxgap=0.127 midlayer5_prefgap=0.127 midlayer5_minwidth=0.072 midlayer5_maxwidth=0.073 midlayer5_prefwidth=0.073 midlayer6_maxgap=0.127 midlayer6_prefgap=0.127 midlayer6_minwidth=0.072 midlayer6_maxwidth=0.073 midlayer6_prefwidth=0.073 midlayer7_maxgap=0.127 midlayer7_prefgap=0.127 midlayer7_minwidth=0.053 midlayer7_maxwidth=0.058 midlayer7_prefwidth=0.058 midlayer8_maxgap=0.127 midlayer8_prefgap=0.127 midlayer8_minwidth=0.072 midlayer8_maxwidth=0.073 midlayer8_prefwidth=0.073 midlayer13_maxgap=0.127 midlayer13_prefgap=0.127 midlayer13_minwidth=0.072 midlayer13_maxwidth=0.073 midlayer13_prefwidth=0.073 midlayer14_maxgap=0.127 midlayer14_prefgap=0.127 midlayer14_minwidth=0.053 midlayer14_maxwidth=0.058 midlayer14_prefwidth=0.058 bottomlayer_maxgap=0.127 bottomlayer_prefgap=0.127 bottomlayer_minwidth=0.045 bottomlayer_maxwidth=0.088 bottomlayer_prefwidth=0.045 impedanceprofiledriven=TRUE impedanceprofileid={3149E961-6C2D-4C90-A41E-90A05D6C6F09} maxuncoupledlength=12.7 // Differential 100 Ohm
DiffPairsRouting "Diff 90" [InDifferentialPairClass('Diff_90')] p4: maxlimit=0.254 minlimit=0.127 mostfreqgap=0.254 toplayer_maxgap=0.127 toplayer_prefgap=0.127 toplayer_minwidth=0.045 toplayer_maxwidth=0.088 toplayer_prefwidth=0.045 midlayer1_maxgap=0.127 midlayer1_prefgap=0.127 midlayer1_minwidth=0.072 midlayer1_maxwidth=0.073 midlayer1_prefwidth=0.073 midlayer2_maxgap=0.127 midlayer2_prefgap=0.127 midlayer2_minwidth=0.072 midlayer2_maxwidth=0.073 midlayer2_prefwidth=0.073 midlayer5_maxgap=0.127 midlayer5_prefgap=0.127 midlayer5_minwidth=0.072 midlayer5_maxwidth=0.073 midlayer5_prefwidth=0.073 midlayer6_maxgap=0.127 midlayer6_prefgap=0.127 midlayer6_minwidth=0.072 midlayer6_maxwidth=0.073 midlayer6_prefwidth=0.073 midlayer7_maxgap=0.127 midlayer7_prefgap=0.127 midlayer7_minwidth=0.053 midlayer7_maxwidth=0.058 midlayer7_prefwidth=0.058 midlayer8_maxgap=0.127 midlayer8_prefgap=0.127 midlayer8_minwidth=0.072 midlayer8_maxwidth=0.073 midlayer8_prefwidth=0.073 midlayer13_maxgap=0.127 midlayer13_prefgap=0.127 midlayer13_minwidth=0.072 midlayer13_maxwidth=0.073 midlayer13_prefwidth=0.073 midlayer14_maxgap=0.127 midlayer14_prefgap=0.127 midlayer14_minwidth=0.053 midlayer14_maxwidth=0.058 midlayer14_prefwidth=0.058 bottomlayer_maxgap=0.127 bottomlayer_prefgap=0.127 bottomlayer_minwidth=0.045 bottomlayer_maxwidth=0.088 bottomlayer_prefwidth=0.045 impedanceprofiledriven=TRUE impedanceprofileid={3149E961-6C2D-4C90-A41E-90A05D6C6F09} maxuncoupledlength=12.7 // Differential 90 Ohm
HoleSize DrillHole [All] p1: absolutevalues=TRUE maxlimit=5 minlimit=0.1 maxpercent=80.000 minpercent=20.000
HoleToHoleClearance [All] p1: gap=0.1 allowstackedmicrovias=TRUE
MatchedLengths MatchedLengths_DDR_CLOCKS_STROBES [InxSignalClass('ADDR_PP1') OR InxSignalClass('ADDR_PP2') OR InxSignalClass('ADDR_PP3') OR InxSignalClass('ADDR_PP4') OR InxSignalClass('DATA_BL0') OR InxSignalClass('DATA_BL1') OR InxSignalClass('DATA_BL2') OR InxSignalClass('DATA_BL3') OR InxSignalClass('DATA_BL4') OR InxSignalClass('DATA_BL5') OR InxSignalClass('DATA_BL6') OR InxSignalClass('DATA_BL7')] p1: tolerance=0.305 checknetsindiffpair=TRUE checkdiffpairvsdiffpair=FALSE checkxsignals=FALSE checkothers=FALSE
MatchedLengths MatchedLengths_DATA_BL7 [InxSignalClass('DATA_BL7')] p2: tolerance=1.473 checknetsindiffpair=FALSE checkdiffpairvsdiffpair=TRUE checkxsignals=TRUE checkothers=TRUE
MatchedLengths MatchedLengths_DATA_BL6 [InxSignalClass('DATA_BL6')] p3: tolerance=1.473 checknetsindiffpair=FALSE checkdiffpairvsdiffpair=TRUE checkxsignals=TRUE checkothers=TRUE
MatchedLengths MatchedLengths_DATA_BL5 [InxSignalClass('DATA_BL5')] p4: tolerance=1.473 checknetsindiffpair=FALSE checkdiffpairvsdiffpair=TRUE checkxsignals=TRUE checkothers=TRUE
MatchedLengths MatchedLengths_DATA_BL4 [InxSignalClass('DATA_BL4')] p5: tolerance=1.473 checknetsindiffpair=FALSE checkdiffpairvsdiffpair=TRUE checkxsignals=TRUE checkothers=TRUE
MatchedLengths MatchedLengths_DATA_BL3 [InxSignalClass('DATA_BL3')] p6: tolerance=1.473 checknetsindiffpair=FALSE checkdiffpairvsdiffpair=TRUE checkxsignals=TRUE checkothers=TRUE
MatchedLengths MatchedLengths_DATA_BL2 [InxSignalClass('DATA_BL2')] p7: tolerance=1.473 checknetsindiffpair=FALSE checkdiffpairvsdiffpair=TRUE checkxsignals=TRUE checkothers=TRUE
MatchedLengths MatchedLengths_DATA_BL1 [InxSignalClass('DATA_BL1')] p8: tolerance=1.473 checknetsindiffpair=FALSE checkdiffpairvsdiffpair=TRUE checkxsignals=TRUE checkothers=TRUE
MatchedLengths MatchedLengths_DATA_BL0 [InxSignalClass('DATA_BL0')] p9: tolerance=1.473 checknetsindiffpair=FALSE checkdiffpairvsdiffpair=TRUE checkxsignals=TRUE checkothers=TRUE
MatchedLengths MatchedLengths_ADDR_PP4 [InxSignalClass('ADDR_PP4')] p10 off: tolerance=1.194 checknetsindiffpair=FALSE checkdiffpairvsdiffpair=TRUE checkxsignals=TRUE checkothers=TRUE
MatchedLengths MatchedLengths_ADDR_PP3 [InxSignalClass('ADDR_PP3')] p11 off: tolerance=1.194 checknetsindiffpair=FALSE checkdiffpairvsdiffpair=TRUE checkxsignals=TRUE checkothers=TRUE
MatchedLengths MatchedLengths_ADDR_PP2 [InxSignalClass('ADDR_PP2')] p12: tolerance=1.194 checknetsindiffpair=FALSE checkdiffpairvsdiffpair=TRUE checkxsignals=TRUE checkothers=TRUE
MatchedLengths MatchedLengths_ADDR_PP1 [InxSignalClass('ADDR_PP1')] p13: tolerance=1.194 checknetsindiffpair=FALSE checkdiffpairvsdiffpair=TRUE checkxsignals=TRUE checkothers=TRUE
MatchedLengths SFP_Data [InNetClass('SFP_diff')] p14: tolerance=0.305 checknetsindiffpair=FALSE checkdiffpairvsdiffpair=TRUE checkxsignals=TRUE checkothers=TRUE
MatchedLengths DiferentialPairSkew [All] p15: tolerance=25.4 checknetsindiffpair=TRUE checkdiffpairvsdiffpair=FALSE checkxsignals=FALSE checkothers=FALSE
MatchedLengths RAM_Data_to_DQS [InNetClass('Lenght_DQS_to_Data')] p16 off: tolerance=25.4 checknetsindiffpair=FALSE checkdiffpairvsdiffpair=TRUE checkxsignals=TRUE checkothers=TRUE
MatchedLengths RAM_DQS_to_CK [InNetClass('Lenght_DQS_to_CK')] p17 off: tolerance=25.4 checknetsindiffpair=FALSE checkdiffpairvsdiffpair=TRUE checkxsignals=TRUE checkothers=TRUE
MatchedLengths MatchedLengths_DDR_DQS [InNetClass('RAM_DQS_Strobe')] p18 off: tolerance=0.305 checknetsindiffpair=TRUE checkdiffpairvsdiffpair=FALSE checkxsignals=FALSE checkothers=FALSE
MatchedLengths RAM_Addr_LenghMatch [InNetClass('RAM_Adress')] p19 off: tolerance=0.305 checknetsindiffpair=FALSE checkdiffpairvsdiffpair=TRUE checkxsignals=TRUE checkothers=TRUE
MatchedLengths Ram_Addr_Com_Ctrl_to_CK [InNetClass('Lenght_CK_to_Addr')] p20 off: tolerance=0.305 checknetsindiffpair=FALSE checkdiffpairvsdiffpair=TRUE checkxsignals=TRUE checkothers=TRUE
MatchedLengths RAM_MatchedLengths_DATA_IO [InNetClass('RAM_Data_IO')] p21 off: tolerance=0.305 checknetsindiffpair=FALSE checkdiffpairvsdiffpair=TRUE checkxsignals=TRUE checkothers=TRUE
MinimumAnnularRing DefRing [All] p1: minimumring=0.15
MinimumSolderMaskSliver [All] p1: minsoldermaskwidth=0.1
PlaneConnect [All] p1: planeconnectstyle=Direct reliefexpansion=0.508 reliefentries=4 reliefconductorwidth=0.254 reliefairgap=0.254
PolygonConnect [All] p1: connectstyle=Direct reliefconductorwidth=0.254 reliefentries=4 polygonreliefangle="90 Angle" airgapwidth=0.254
RoomDefinition 5V_to_3V3_for_FTDI [InComponentClass('5V_to_3V3_for_FTDI')] p1: confinementstyle=ConfineIn formatcopy=TRUE lockcomponents=FALSE outline 0,0 50.8,0 50.8,25.4 0,25.4
RoomDefinition I2C_Expander_16 [InComponentClass('I2C_Expander_16')] p2: confinementstyle=ConfineIn formatcopy=TRUE lockcomponents=FALSE outline 0,0 50.8,0 50.8,25.4 0,25.4
RoomDefinition I2C_Expander_15 [InComponentClass('I2C_Expander_15')] p3: confinementstyle=ConfineIn formatcopy=TRUE lockcomponents=FALSE outline 0,0 50.8,0 50.8,25.4 0,25.4
RoomDefinition I2C_Expander_14 [InComponentClass('I2C_Expander_14')] p4: confinementstyle=ConfineIn formatcopy=TRUE lockcomponents=FALSE outline 0,0 50.8,0 50.8,25.4 0,25.4
RoomDefinition I2C_Expander_13 [InComponentClass('I2C_Expander_13')] p5: confinementstyle=ConfineIn formatcopy=TRUE lockcomponents=FALSE outline 0,0 50.8,0 50.8,25.4 0,25.4
RoomDefinition I2C_Expander_12 [InComponentClass('I2C_Expander_12')] p6: confinementstyle=ConfineIn formatcopy=TRUE lockcomponents=FALSE outline 0,0 50.8,0 50.8,25.4 0,25.4
RoomDefinition I2C_Expander_11 [InComponentClass('I2C_Expander_11')] p7: confinementstyle=ConfineIn formatcopy=TRUE lockcomponents=FALSE outline 0,0 50.8,0 50.8,25.4 0,25.4
RoomDefinition I2C_Expander_10 [InComponentClass('I2C_Expander_10')] p8: confinementstyle=ConfineIn formatcopy=TRUE lockcomponents=FALSE outline 0,0 50.8,0 50.8,25.4 0,25.4
RoomDefinition I2C_Expander? [InComponentClass('I2C_Expander?')] p9: confinementstyle=ConfineIn formatcopy=TRUE lockcomponents=FALSE outline 0,0 50.8,0 50.8,25.4 0,25.4
RoomDefinition U_TPS7A88_3V3_1V8_0V9V@2x1A [InComponentClass('U_TPS7A88_3V3_1V8_0V9V@2x1A')] p10: confinementstyle=ConfineIn formatcopy=TRUE lockcomponents=FALSE outline 0,0 50.8,0 50.8,25.4 0,25.4
RoomDefinition U_Pomiar_pradu_napiecia_11 [InComponentClass('U_Pomiar_pradu_napiecia_11')] p11: confinementstyle=ConfineIn formatcopy=TRUE lockcomponents=FALSE outline 0,0 50.8,0 50.8,25.4 0,25.4
RoomDefinition U_Pomiar_pradu_napiecia_10 [InComponentClass('U_Pomiar_pradu_napiecia_10')] p12: confinementstyle=ConfineIn formatcopy=TRUE lockcomponents=FALSE outline 0,0 50.8,0 50.8,25.4 0,25.4
RoomDefinition U_Pomiar_pradu_napiecia_9 [InComponentClass('U_Pomiar_pradu_napiecia_9')] p13: confinementstyle=ConfineIn formatcopy=TRUE lockcomponents=FALSE outline 0,0 50.8,0 50.8,25.4 0,25.4
RoomDefinition U_Pomiar_pradu_napiecia_8 [InComponentClass('U_Pomiar_pradu_napiecia_8')] p14: confinementstyle=ConfineIn formatcopy=TRUE lockcomponents=FALSE outline 0,0 50.8,0 50.8,25.4 0,25.4
RoomDefinition U_Pomiar_pradu_napiecia_7 [InComponentClass('U_Pomiar_pradu_napiecia_7')] p15: confinementstyle=ConfineIn formatcopy=TRUE lockcomponents=FALSE outline 0,0 50.8,0 50.8,25.4 0,25.4
RoomDefinition U_Pomiar_pradu_napiecia_6 [InComponentClass('U_Pomiar_pradu_napiecia_6')] p16: confinementstyle=ConfineIn formatcopy=TRUE lockcomponents=FALSE outline 0,0 50.8,0 50.8,25.4 0,25.4
RoomDefinition U_Pomiar_pradu_napiecia_5 [InComponentClass('U_Pomiar_pradu_napiecia_5')] p17: confinementstyle=ConfineIn formatcopy=TRUE lockcomponents=FALSE outline 0,0 50.8,0 50.8,25.4 0,25.4
RoomDefinition U_Pomiar_pradu_napiecia_4 [InComponentClass('U_Pomiar_pradu_napiecia_4')] p18: confinementstyle=ConfineIn formatcopy=TRUE lockcomponents=FALSE outline 0,0 50.8,0 50.8,25.4 0,25.4
RoomDefinition U_Pomiar_pradu_napiecia_3 [InComponentClass('U_Pomiar_pradu_napiecia_3')] p19: confinementstyle=ConfineIn formatcopy=TRUE lockcomponents=FALSE outline 0,0 50.8,0 50.8,25.4 0,25.4
RoomDefinition U_Pomiar_pradu_napiecia_2 [InComponentClass('U_Pomiar_pradu_napiecia_2')] p20: confinementstyle=ConfineIn formatcopy=TRUE lockcomponents=FALSE outline 0,0 50.8,0 50.8,25.4 0,25.4
RoomDefinition U_5V_to_3V32 [InComponentClass('U_5V_to_3V32')] p21: confinementstyle=ConfineIn formatcopy=TRUE lockcomponents=FALSE outline 0,0 50.8,0 50.8,25.4 0,25.4
RoomDefinition U_5V_to_3V31 [InComponentClass('U_5V_to_3V31')] p22: confinementstyle=ConfineIn formatcopy=TRUE lockcomponents=FALSE outline 0,0 50.8,0 50.8,25.4 0,25.4
RoomDefinition SFP_Group+IMU [InComponentClass('SFP_Group+IMU')] p23: confinementstyle=ConfineIn formatcopy=TRUE lockcomponents=FALSE outline 0,0 50.8,0 50.8,25.4 0,25.4
RoomDefinition IMU [InComponentClass('IMU')] p24: confinementstyle=ConfineIn formatcopy=TRUE lockcomponents=FALSE outline 0,0 50.8,0 50.8,25.4 0,25.4
RoomDefinition I2C_Expander3 [InComponentClass('I2C_Expander3')] p25: confinementstyle=ConfineIn formatcopy=TRUE lockcomponents=FALSE outline 0,0 50.8,0 50.8,25.4 0,25.4
RoomDefinition I2C_Expander2 [InComponentClass('I2C_Expander2')] p26: confinementstyle=ConfineIn formatcopy=TRUE lockcomponents=FALSE outline 0,0 50.8,0 50.8,25.4 0,25.4
RoomDefinition I2C_Expander1 [InComponentClass('I2C_Expander1')] p27: confinementstyle=ConfineIn formatcopy=TRUE lockcomponents=FALSE outline 0,0 50.8,0 50.8,25.4 0,25.4
RoomDefinition HighSpeed [InComponentClass('HighSpeed')] p28: confinementstyle=ConfineIn formatcopy=TRUE lockcomponents=FALSE outline 0,0 50.8,0 50.8,25.4 0,25.4
RoomDefinition GTR [InComponentClass('GTR')] p29: confinementstyle=ConfineIn formatcopy=TRUE lockcomponents=FALSE outline 0,0 50.8,0 50.8,25.4 0,25.4
RoomDefinition Flash_Memory [InComponentClass('Flash_Memory')] p30: confinementstyle=ConfineIn formatcopy=TRUE lockcomponents=FALSE outline 0,0 50.8,0 50.8,25.4 0,25.4
RoomDefinition Ext_GPIO [InComponentClass('Ext_GPIO')] p31: confinementstyle=ConfineIn formatcopy=TRUE lockcomponents=FALSE outline 0,0 50.8,0 50.8,25.4 0,25.4
RoomDefinition DAC [InComponentClass('DAC')] p32: confinementstyle=ConfineIn formatcopy=TRUE lockcomponents=FALSE outline 0,0 50.8,0 50.8,25.4 0,25.4
RoomDefinition "Bank 226" [InComponentClass('Bank 226')] p33: confinementstyle=ConfineIn formatcopy=TRUE lockcomponents=FALSE outline 0,0 50.8,0 50.8,25.4 0,25.4
RoomDefinition "Bank 225" [InComponentClass('Bank 225')] p34: confinementstyle=ConfineIn formatcopy=TRUE lockcomponents=FALSE outline 0,0 50.8,0 50.8,25.4 0,25.4
RoomDefinition "Bank 224" [InComponentClass('Bank 224')] p35: confinementstyle=ConfineIn formatcopy=TRUE lockcomponents=FALSE outline 0,0 50.8,0 50.8,25.4 0,25.4
RoomDefinition "Bank 223" [InComponentClass('Bank 223')] p36: confinementstyle=ConfineIn formatcopy=TRUE lockcomponents=FALSE outline 0,0 50.8,0 50.8,25.4 0,25.4
RoomDefinition USB3.0 [InComponentClass('USB3.0')] p37: confinementstyle=ConfineIn formatcopy=TRUE lockcomponents=FALSE outline 0,0 50.8,0 50.8,25.4 0,25.4
RoomDefinition U_Pomiar_pradu_napiecia_1 [InComponentClass('U_Pomiar_pradu_napiecia_1')] p38: confinementstyle=ConfineIn formatcopy=TRUE lockcomponents=FALSE outline 0,0 50.8,0 50.8,25.4 0,25.4
RoomDefinition U_Pomiar_napiecia_high_curr [InComponentClass('U_Pomiar_napiecia_high_curr')] p39: confinementstyle=ConfineIn formatcopy=TRUE lockcomponents=FALSE outline 0,0 50.8,0 50.8,25.4 0,25.4
RoomDefinition U_FPGA_Decoupling [InComponentClass('U_FPGA_Decoupling')] p40: confinementstyle=ConfineIn formatcopy=TRUE lockcomponents=FALSE outline 0,0 50.8,0 50.8,25.4 0,25.4
RoomDefinition U_Expander_RESET [InComponentClass('U_Expander_RESET')] p41: confinementstyle=ConfineIn formatcopy=TRUE lockcomponents=FALSE outline 0,0 50.8,0 50.8,25.4 0,25.4
RoomDefinition U_CAN [InComponentClass('U_CAN')] p42: confinementstyle=ConfineIn formatcopy=TRUE lockcomponents=FALSE outline 0,0 50.8,0 50.8,25.4 0,25.4
RoomDefinition PS_Config [InComponentClass('PS_Config')] p43: confinementstyle=ConfineIn formatcopy=TRUE lockcomponents=FALSE outline 0,0 50.8,0 50.8,25.4 0,25.4
RoomDefinition NVMe [InComponentClass('NVMe')] p44: confinementstyle=ConfineIn formatcopy=TRUE lockcomponents=FALSE outline 0,0 50.8,0 50.8,25.4 0,25.4
RoomDefinition "Gigabit Eth" [InComponentClass('Gigabit Eth')] p45: confinementstyle=ConfineIn formatcopy=TRUE lockcomponents=FALSE outline 0,0 50.8,0 50.8,25.4 0,25.4
RoomDefinition Debug [InComponentClass('Debug')] p46: confinementstyle=ConfineIn formatcopy=TRUE lockcomponents=FALSE outline 0,0 50.8,0 50.8,25.4 0,25.4
RoomDefinition CLK_MUX [InComponentClass('CLK_MUX')] p47: confinementstyle=ConfineIn formatcopy=TRUE lockcomponents=FALSE outline 0,0 50.8,0 50.8,25.4 0,25.4
RoomDefinition µSD [InComponentClass('µSD')] p48: confinementstyle=ConfineIn formatcopy=TRUE lockcomponents=FALSE outline 0,0 50.8,0 50.8,25.4 0,25.4
RoomDefinition U_UM78M_12_8V [InComponentClass('U_UM78M_12_8V')] p49: confinementstyle=ConfineIn formatcopy=TRUE lockcomponents=FALSE outline 0,0 50.8,0 50.8,25.4 0,25.4
RoomDefinition U_TPS7A88_5V_Dual_3 [InComponentClass('U_TPS7A88_5V_Dual_3')] p50: confinementstyle=ConfineIn formatcopy=TRUE lockcomponents=FALSE outline 0,0 50.8,0 50.8,25.4 0,25.4
RoomDefinition U_ST1L08_5V_0V6 [InComponentClass('U_ST1L08_5V_0V6')] p51: confinementstyle=ConfineIn formatcopy=TRUE lockcomponents=FALSE outline 0,0 50.8,0 50.8,25.4 0,25.4
RoomDefinition U_Power_Ethernet [InComponentClass('U_Power_Ethernet')] p52: confinementstyle=ConfineIn formatcopy=TRUE lockcomponents=FALSE outline 0,0 50.8,0 50.8,25.4 0,25.4
RoomDefinition U_Power_ADP1850_Dual_2 [InComponentClass('U_Power_ADP1850_Dual_2')] p53: confinementstyle=ConfineIn formatcopy=TRUE lockcomponents=FALSE outline 0,0 50.8,0 50.8,25.4 0,25.4
RoomDefinition U_Power_48_20V@3A [InComponentClass('U_Power_48_20V@3A')] p54: confinementstyle=ConfineIn formatcopy=TRUE lockcomponents=FALSE outline 0,0 50.8,0 50.8,25.4 0,25.4
RoomDefinition U_LT3042_12V_5V_LNLDO [InComponentClass('U_LT3042_12V_5V_LNLDO')] p55: confinementstyle=ConfineIn formatcopy=TRUE lockcomponents=FALSE outline 0,0 50.8,0 50.8,25.4 0,25.4
RoomDefinition U_HI_Curr_ADP1850_3 [InComponentClass('U_HI_Curr_ADP1850_3')] p56: confinementstyle=ConfineIn formatcopy=TRUE lockcomponents=FALSE outline 0,0 50.8,0 50.8,25.4 0,25.4
RoomDefinition U_HI_Curr_ADP1850_1 [InComponentClass('U_HI_Curr_ADP1850_1')] p57: confinementstyle=ConfineIn formatcopy=TRUE lockcomponents=FALSE outline 0,0 50.8,0 50.8,25.4 0,25.4
RoomDefinition U_Detektor_otwarcia [InComponentClass('U_Detektor_otwarcia')] p58: confinementstyle=ConfineIn formatcopy=TRUE lockcomponents=FALSE outline 0,0 50.8,0 50.8,25.4 0,25.4
RoomDefinition U_ADP1741_3V3_0V85 [InComponentClass('U_ADP1741_3V3_0V85')] p59: confinementstyle=ConfineIn formatcopy=TRUE lockcomponents=FALSE outline 0,0 50.8,0 50.8,25.4 0,25.4
RoomDefinition U_ADP1741_3 [InComponentClass('U_ADP1741_3')] p60: confinementstyle=ConfineIn formatcopy=TRUE lockcomponents=FALSE outline 0,0 50.8,0 50.8,25.4 0,25.4
RoomDefinition U_5V_to_3V33 [InComponentClass('U_5V_to_3V33')] p61: confinementstyle=ConfineIn formatcopy=TRUE lockcomponents=FALSE outline 0,0 50.8,0 50.8,25.4 0,25.4
RoutingTopology RoutingTopology_DDRAddressAndControls [InNetClass('DDR_AddressAndControls')] p1: topology=Daisy_Simple
RoutingTopology [All] p2: topology=Shortest
RoutingVias BackDrilled_1-5 [InDrillLayerPair('[BD] L5 (Sign) - L16')] p1: holewidth=0.2 width=0.5 viastyle="Through Hole" minholewidth=0.2 minwidth=0.5 maxholewidth=0.2 maxwidth=0.5
RoutingVias BackDrilled_1-14 [InDrillLayerPair('[BD] L14 (Sign) - L16')] p2: holewidth=0.2 width=0.5 viastyle="Through Hole" minholewidth=0.2 minwidth=0.5 maxholewidth=0.2 maxwidth=0.5
RoutingVias BackDrilled_1-12 [InDrillLayerPair('[BD] L12 (Sign) - L16')] p3: holewidth=0.2 width=0.5 viastyle="Through Hole" minholewidth=0.2 minwidth=0.5 maxholewidth=0.2 maxwidth=0.5
RoutingVias Vi14-16 [InDrillLayerPair('[UVIA] L14 (Sign) - L16')] p4: holewidth=0.127 width=0.35 viastyle="Through Hole" minholewidth=0.1 minwidth=0.2 maxholewidth=0.127 maxwidth=0.35
RoutingVias UVia1-2 [InDrillLayerPair('[UVIA] L1 - L2 (GND)')] p5: holewidth=0.127 width=0.35 viastyle="Through Hole" minholewidth=0.127 minwidth=0.35 maxholewidth=0.127 maxwidth=0.35
RoutingVias UVia1-3 [InDrillLayerPair('[UVIA] L1 - L3 (Sign)')] p6: holewidth=0.127 width=0.35 viastyle="Through Hole" minholewidth=0.1 minwidth=0.2 maxholewidth=0.127 maxwidth=0.35
RoutingVias UVia16-15 [InDrillLayerPair('[UVIA] L15 (GND) - L16')] p7: holewidth=0.127 width=0.35 viastyle="Through Hole" minholewidth=0.1 minwidth=0.2 maxholewidth=0.127 maxwidth=0.35
RoutingVias UVia14-15 [InDrillLayerPair('No Drill Pair')] p8: holewidth=0.127 width=0.35 viastyle="Through Hole" minholewidth=0.127 minwidth=0.35 maxholewidth=0.127 maxwidth=0.35
RoutingVias Diff_Pair_Via [InDifferentialPairClass('All Differential Pairs')] p9: holewidth=0.2 width=0.4 viastyle="Through Hole" minholewidth=0.127 minwidth=0.35 maxholewidth=0.3 maxwidth=0.5
RoutingVias [All] p10: holewidth=0.2 width=0.5 viastyle="Through Hole" minholewidth=0.1 minwidth=0.2 maxholewidth=2 maxwidth=2.25
SilkToSilkClearance [All] p1: silktosilkclearance=0.1
SilkToSolderMaskClearance [IsPad] p1: minsilkscreentomaskgap=0 clearancetoexposedcopper=TRUE
SolderMaskExpansion [All] p1: expansion=0.102
Width Power_Line_1 [All] p1: maxlimit=2 minlimit=0.164 preferedwidth=0.912
Width Power_Line_2 [InNetClass('Power_Line_2A')] p2: maxlimit=4.8 minlimit=0.428 preferedwidth=2.37
Width Power_Line_20 [InNetClass('Power_Line_20A')] p3: maxlimit=100 minlimit=7 preferedwidth=50
Width Power_Line_40 [InNetClass('Power_Line_40A')] p4: maxlimit=300 minlimit=26.6 preferedwidth=148
Width Single_Ram_CLK [InNetClass('RAM_Clock_Signal')] p5: maxlimit=0.152 minlimit=0.102 preferedwidth=0.127
Width Single_RAM_Com [InNetClass('RAM_Adress')] p6: maxlimit=0.254 minlimit=0.068 preferedwidth=0.254 toplayer_minwidth=0.116 toplayer_maxwidth=0.211 toplayer_prefwidth=0.184 midlayer1_minwidth=0.092 midlayer1_maxwidth=0.173 midlayer1_prefwidth=0.151 midlayer2_minwidth=0.092 midlayer2_maxwidth=0.173 midlayer2_prefwidth=0.151 midlayer3_minwidth=0.254 midlayer4_minwidth=0.254 midlayer5_minwidth=0.092 midlayer5_maxwidth=0.173 midlayer5_prefwidth=0.151 midlayer6_minwidth=0.092 midlayer6_maxwidth=0.173 midlayer6_prefwidth=0.151 midlayer7_maxwidth=0.132 midlayer7_prefwidth=0.114 midlayer8_minwidth=0.092 midlayer8_maxwidth=0.173 midlayer8_prefwidth=0.151 midlayer9_minwidth=0.092 midlayer9_prefwidth=0.151 midlayer10_minwidth=0.254 midlayer11_minwidth=0.254 midlayer12_minwidth=0.254 midlayer13_minwidth=0.092 midlayer13_maxwidth=0.173 midlayer13_prefwidth=0.151 midlayer14_maxwidth=0.132 midlayer14_prefwidth=0.114 bottomlayer_minwidth=0.116 bottomlayer_maxwidth=0.211 bottomlayer_prefwidth=0.184 minimp=50.000000 maximp=50.000000 favimp=50.000000 // Track's for Adress, comands and control
Width SingleRam_Data [InNetClass('RAM_Data_IO')] p7: maxlimit=0.254 minlimit=0.068 preferedwidth=0.254 toplayer_minwidth=0.116 toplayer_maxwidth=0.211 toplayer_prefwidth=0.184 midlayer1_minwidth=0.092 midlayer1_maxwidth=0.173 midlayer1_prefwidth=0.151 midlayer2_minwidth=0.092 midlayer2_maxwidth=0.173 midlayer2_prefwidth=0.151 midlayer3_minwidth=0.254 midlayer4_minwidth=0.254 midlayer5_minwidth=0.092 midlayer5_maxwidth=0.173 midlayer5_prefwidth=0.151 midlayer6_minwidth=0.092 midlayer6_maxwidth=0.173 midlayer6_prefwidth=0.151 midlayer7_maxwidth=0.132 midlayer7_prefwidth=0.114 midlayer8_minwidth=0.092 midlayer8_maxwidth=0.173 midlayer8_prefwidth=0.151 midlayer9_minwidth=0.092 midlayer9_prefwidth=0.151 midlayer10_minwidth=0.254 midlayer11_minwidth=0.254 midlayer12_minwidth=0.254 midlayer13_minwidth=0.092 midlayer13_maxwidth=0.173 midlayer13_prefwidth=0.151 midlayer14_maxwidth=0.132 midlayer14_prefwidth=0.114 bottomlayer_minwidth=0.116 bottomlayer_maxwidth=0.211 bottomlayer_prefwidth=0.184 minimp=50.000000 maximp=50.000000 favimp=50.000000 // Track's for comand in r
Width Single45 [InNetClass('Single_45')] p8: maxlimit=0.198 minlimit=0.079 preferedwidth=0.198 toplayer_minwidth=0.113 toplayer_maxwidth=0.143 toplayer_prefwidth=0.117 midlayer1_minwidth=0.115 midlayer1_maxwidth=0.115 midlayer1_prefwidth=0.115 midlayer2_minwidth=0.115 midlayer2_maxwidth=0.115 midlayer2_prefwidth=0.115 midlayer3_minwidth=0.198 midlayer4_minwidth=0.198 midlayer5_minwidth=0.115 midlayer5_maxwidth=0.115 midlayer5_prefwidth=0.115 midlayer6_minwidth=0.115 midlayer6_maxwidth=0.115 midlayer6_prefwidth=0.115 midlayer7_maxwidth=0.087 midlayer7_prefwidth=0.087 midlayer8_minwidth=0.115 midlayer8_maxwidth=0.115 midlayer8_prefwidth=0.115 midlayer9_minwidth=0.133 midlayer9_maxwidth=0.133 midlayer9_prefwidth=0.133 midlayer10_minwidth=0.198 midlayer11_minwidth=0.198 midlayer12_minwidth=0.133 midlayer12_maxwidth=0.133 midlayer12_prefwidth=0.133 midlayer13_minwidth=0.115 midlayer13_maxwidth=0.115 midlayer13_prefwidth=0.115 midlayer14_maxwidth=0.087 midlayer14_prefwidth=0.087 bottomlayer_minwidth=0.113 bottomlayer_maxwidth=0.143 bottomlayer_prefwidth=0.117 impedanceprofiledriven=TRUE impedanceprofileid={F22BED46-E16F-4103-815A-6A081543B36A} minimp=50.000000 maximp=50.000000 favimp=50.000000 // Single line impedance 45 Ohm
Width "Single 50" [InNetClass('Single_50')] p9: maxlimit=0.254 minlimit=0.062 preferedwidth=0.254 toplayer_minwidth=0.112 toplayer_maxwidth=0.116 toplayer_prefwidth=0.112 midlayer1_minwidth=0.092 midlayer1_maxwidth=0.092 midlayer1_prefwidth=0.092 midlayer2_minwidth=0.092 midlayer2_maxwidth=0.092 midlayer2_prefwidth=0.092 midlayer5_minwidth=0.092 midlayer5_maxwidth=0.092 midlayer5_prefwidth=0.092 midlayer6_minwidth=0.092 midlayer6_maxwidth=0.092 midlayer6_prefwidth=0.092 midlayer7_maxwidth=0.069 midlayer7_prefwidth=0.069 midlayer8_minwidth=0.092 midlayer8_maxwidth=0.092 midlayer8_prefwidth=0.092 midlayer13_minwidth=0.092 midlayer13_maxwidth=0.092 midlayer13_prefwidth=0.092 midlayer14_maxwidth=0.069 midlayer14_prefwidth=0.069 bottomlayer_minwidth=0.112 bottomlayer_maxwidth=0.116 bottomlayer_prefwidth=0.112 impedanceprofiledriven=TRUE impedanceprofileid={C52096D4-C36E-4BDB-BB83-9E54FFDADA41} minimp=50.000000 maximp=50.000000 favimp=50.000000 checkconnectedcopper=TRUE // Single impedance line 50 Ohm
Width [InNetClass('SFP_diff')] p10 off: maxlimit=0.254 minlimit=0.254 preferedwidth=0.254
22 further rules are at their usual default settings.

## Classes and differential pairs
component class GND: J31
component class I2C_Bridge_2: C303_I2C_Bridge_2 R3_I2C_Bridge_2 R4_I2C_Bridge_2 R5_I2C_Bridge_2 R6_I2C_Bridge_2 R7_I2C_Bridge_2 R8_I2C_Bridge_2 R9_I2C_Bridge_2 R10_I2C_Bridge_2 R223_I2C_Bridge_2 R224_I2C_Bridge_2 R225_I2C_Bridge_2 R226_I2C_Bridge_2 R227_I2C_Bridge_2 R558_I2C_Bridge_2 R559_I2C_Bridge_2 R560_I2C_Bridge_2 TP1_I2C_Bridge_2 TP2_I2C_Bridge_2 TP3_I2C_Bridge_2 TP4_I2C_Bridge_2 TP5_I2C_Bridge_2 TP6_I2C_Bridge_2 TP7_I2C_Bridge_2 TP8_I2C_Bridge_2 TP9_I2C_Bridge_2 TP10_I2C_Bridge_2 TP11_I2C_Bridge_2 TP12_I2C_Bridge_2 TP13_I2C_Bridge_2 TP14_I2C_Bridge_2 TP15_I2C_Bridge_2 TP16_I2C_Bridge_2 TP17_I2C_Bridge_2 TP18_I2C_Bridge_2 U3_I2C_Bridge_2
component class I2C_Expander_16: C311_I2C_Expander_16 U35_I2C_Expander_16
component class I2C_Expander_15: C311_I2C_Expander_15 U35_I2C_Expander_15
component class I2C_Expander_14: C311_I2C_Expander_14 U35_I2C_Expander_14
component class I2C_Expander_13: C311_I2C_Expander_13 U35_I2C_Expander_13
component class I2C_Expander_12: C311_I2C_Expander_12 U35_I2C_Expander_12
component class I2C_Expander_11: C311_I2C_Expander_11 U35_I2C_Expander_11
component class I2C_Expander_10: C311_I2C_Expander_10 U35_I2C_Expander_10
component class I2C_Expander?: C311_I2C_Expander? U35_I2C_Expander?
net class Power_Line_40A: 0.85V@40A_INA US+_Vcc_PS_IntFp
net class Power_Line_20A: 3V3_Rail RAM_Vcc1V2 Vout1_1 Vout2_1
net class Power_Line_10A: 3.3Vaux 5V_RAIL 12V_HiSpeed Vout1_2 Vout_5V@10A_INA
net class Power_Line_2A: 0V9@1A_REG3 0V85@2A 1V0@1.5A 1V8@0.5A_ADC_filtered 1V8@1.5A 2V5@1.5A 3.3V_LN_1 3.3V_Stable_1 3.3V_Stable_2 3.3V_Stable_3 3V3_Rail 12V_PCIE0 12V_PCIE0_CM 12V_PCIE1 12V_PCIE1_CM 12V_PCIE2 12V_PCIE2_CM 12V_PCIE3 12V_PCIE3_CM 12V_PCIE4 12V_PCIE4_CM FTDI_5V FTDI_VBUS FTDI_VccIO NetC568_2 NetC674_2
component class I2C_Expander1: C311_I2C_Expander1 U35_I2C_Expander1
component class U_FPGA_Decoupling: C738 C739 C740 C741 C742 C743 C744 C745 C746 C747 C748 C749 C750 C751 C752 C753 C754 C755 C756 C757 C758 C759 C760 C761 C762 C763 C764 C765
component class U_Expander_RESET: R746 R747 R748 R749 R750 R751 R752 R753 R754 R755 R756 R757 R758 R759 R760 R761 R762 R763
net class NVME_DATA_BANK: NVME_C_RX_1_N NVME_C_RX_1_P NVME_C_RX_O_N NVME_C_RX_O_P NVME_C_TX_1_N NVME_C_TX_1_P NVME_C_TX_O_N NVME_C_TX_O_P
component class U_ST1L08_5V_0V6: C720 C721 C722 C723 R689 R690 R691 U73
component class U_Pomiar_napiecia_high_curr: C310 R617 U72
component class U_UM78M_12_8V: C713 C714 U71
component class U_TPS7A88_3V3_1V8_0V9V@2x1A: C705 C706 C707 C708 C709 C710 C711 C712 R671 R672 R673 R674 R676 R745 U70
component class U_ADP1741_3V3_0V85: C674 C675 C676 C719 FB45 R435 R644 R645 R646 R668 U69
net class eMMC_Data: eMMC_data0 eMMC_data1 eMMC_data2 eMMC_data3 eMMC_data4 eMMC_data5 eMMC_data6 eMMC_data7
net class eMMC_Cmd: eMMC_clk eMMC_cmd eMMC_rst
component class Debug: C558 C559 C560 C658 C659 C660 C661 C662 C663 C664 C665 C666 C667 C668 C669 C670 C671 C672 C673 C791 C792 D15 FB31 FB32 FB43 FB44 P12 R401 R402 R403 R404 R405 R406 R407 R408 R409 R410 R411 R412 R413 R414 R415 R416 R417 R418 R419 R420 R421 R422 R423 R424 R635 R636 R637 R638 R639 R640 R641 R642 R643 R721 R722 R723 R724 R725 R726 R727 R728 R729 R730 R731 R732 R733 R734 U53 U54 U55 U56 U57 U77 U78 U79 X8
component class LowCurr: C304 C305 C306 C307 C308 C354 C355 C603 C604 C605 C606 C607 C610 C611 C612 C613 C614 C615 C616 C617 C618 C619 C620 C621 C622 C623 C624 C625 C626 D16 D17 D18 D19 L13 L15 L16 L17 L18 R113 R114 R212 R214 R216 R218 R220 R274 R284 R305 R308 R309 U19 U67
net class uSD_to_MIO: CD_H DIR_CMD DIR_DAT0_H DIR_DAT1_H uSD_CLK uSD_CMD uSD_D0 uSD_D1 uSD_D2 uSD_D3 uSD_D4
net class uSD_to_Driv: CD_H CMD_SD DATA0_SD DATA1_SD DATA2_SD DATA3_SD SD_Card_CLK
component class U_Detektor_otwarcia: BT1 BT? C609 C678 C679 C680 D20 D21 D22 D23 R647 R648 R649 R650 R651 R652 R653 R654 R655 R656 R657 R658 T22 T23 T24 T25 T26 T27 T28 T29 T30 T31
net class RAM_DQS_Strobe: DDR4_DQS_0_N DDR4_DQS_0_P DDR4_DQS_1_N DDR4_DQS_1_P DDR4_DQS_2_N DDR4_DQS_2_P DDR4_DQS_3_N DDR4_DQS_3_P DDR4_DQS_4_N DDR4_DQS_4_P DDR4_DQS_5_N DDR4_DQS_5_P DDR4_DQS_6_N DDR4_DQS_6_P DDR4_DQS_7_N DDR4_DQS_7_P DDR4_DQS_8_N DDR4_DQS_8_P
net class RAM_Data_IO: DDR4_DM0 DDR4_DM1 DDR4_DM2 DDR4_DM3 DDR4_DM4 DDR4_DM5 DDR4_DM6 DDR4_DM7 DDR4_DQ0 DDR4_DQ1 DDR4_DQ2 DDR4_DQ3 DDR4_DQ4 DDR4_DQ5 DDR4_DQ6 DDR4_DQ7 DDR4_DQ8 DDR4_DQ9 DDR4_DQ10 DDR4_DQ11 DDR4_DQ12 DDR4_DQ13 DDR4_DQ14 DDR4_DQ15 DDR4_DQ16 DDR4_DQ17 DDR4_DQ18 DDR4_DQ19 DDR4_DQ20 DDR4_DQ21 DDR4_DQ22 DDR4_DQ23 DDR4_DQ24 DDR4_DQ25 DDR4_DQ26 DDR4_DQ27 DDR4_DQ28 DDR4_DQ29 DDR4_DQ30 DDR4_DQ31 DDR4_DQ32 DDR4_DQ33 DDR4_DQ34 DDR4_DQ35 DDR4_DQ36 DDR4_DQ37 DDR4_DQ38 DDR4_DQ39 DDR4_DQ40 DDR4_DQ41 DDR4_DQ42 DDR4_DQ43 DDR4_DQ44 DDR4_DQ45 DDR4_DQ46 DDR4_DQ47 DDR4_DQ48 DDR4_DQ49 DDR4_DQ50 DDR4_DQ51 DDR4_DQ52 DDR4_DQ53 DDR4_DQ54 DDR4_DQ55 DDR4_DQ56 DDR4_DQ57 DDR4_DQ58 DDR4_DQ59 DDR4_DQ60 DDR4_DQ61 DDR4_DQ62 DDR4_DQ63
net class Power_Line_1A: 3.3V_PS_Config 12V_HiSpeed ADP1741_3.6V FPGA_Vcc_HD NetD16_2 NetD17_1 NetD17_2 NetD18_1 NetD18_2 NetD19_1 NetD19_2 Power_3.3_1 Power_3.3_2 US+_Vcc_PS_DDR_504
net class Lenght_DQS_to_Data: DDR4_DM0 DDR4_DM1 DDR4_DM2 DDR4_DM3 DDR4_DM4 DDR4_DM5 DDR4_DM6 DDR4_DM7 DDR4_DQ0 DDR4_DQ1 DDR4_DQ2 DDR4_DQ3 DDR4_DQ4 DDR4_DQ5 DDR4_DQ6 DDR4_DQ7 DDR4_DQ8 DDR4_DQ9 DDR4_DQ10 DDR4_DQ11 DDR4_DQ12 DDR4_DQ13 DDR4_DQ14 DDR4_DQ15 DDR4_DQ16 DDR4_DQ17 DDR4_DQ18 DDR4_DQ19 DDR4_DQ20 DDR4_DQ21 DDR4_DQ22 DDR4_DQ23 DDR4_DQ24 DDR4_DQ25 DDR4_DQ26 DDR4_DQ27 DDR4_DQ28 DDR4_DQ29 DDR4_DQ30 DDR4_DQ31 DDR4_DQ32 DDR4_DQ33 DDR4_DQ34 DDR4_DQ35 DDR4_DQ36 DDR4_DQ37 DDR4_DQ38 DDR4_DQ39 DDR4_DQ40 DDR4_DQ41 DDR4_DQ42 DDR4_DQ43 DDR4_DQ44 DDR4_DQ45 DDR4_DQ46 DDR4_DQ47 DDR4_DQ48 DDR4_DQ49 DDR4_DQ50 DDR4_DQ51 DDR4_DQ52 DDR4_DQ53 DDR4_DQ54 DDR4_DQ55 DDR4_DQ56 DDR4_DQ57 DDR4_DQ58 DDR4_DQ59 DDR4_DQ60 DDR4_DQ61 DDR4_DQ62 DDR4_DQ63
net class Lenght_DQS_to_CK: DDR4_DQS_0_N DDR4_DQS_0_P DDR4_DQS_1_N DDR4_DQS_1_P DDR4_DQS_2_N DDR4_DQS_2_P DDR4_DQS_3_N DDR4_DQS_3_P DDR4_DQS_4_N DDR4_DQS_4_P DDR4_DQS_5_N DDR4_DQS_5_P DDR4_DQS_6_N DDR4_DQS_6_P DDR4_DQS_7_N DDR4_DQS_7_P DDR4_DQS_8_N DDR4_DQS_8_P
net class Lenght_CK_to_Addr: DDR4_CK_N DDR4_CK_P
differential pair class Diff_76_to_90_Ram_CLK: DDR4_CK
net class RAM_Adress: DDR4_A0 DDR4_A1 DDR4_A2 DDR4_A3 DDR4_A4 DDR4_A5 DDR4_A6 DDR4_A7 DDR4_A8 DDR4_A9 DDR4_A10 DDR4_A11 DDR4_A12 DDR4_A13 DDR4_ACT_N DDR4_BA0 DDR4_BA1 DDR4_BG0 DDR4_CAS DDR4_CKE0 DDR4_CS_B DDR4_DQS_ODT0 DDR4_PARITY DDR4_RAM_RST_N DDR4_RAS DDR4_WE
component class U_Power_48_20V@3A: C595 C596 C597 C598 C693 C694 C695 C696 C697 C698 C699 C700 C701 C702 C703 C704 D26 D27 L22 R140 R149 R150 R159 R160 R665 R666 R667 R669 R670 R764 T34 T35 U65
net class WR_CLK_C: WR_Source_CLK_N WR_Source_CLK_P
net class WR_CLK_C_LMK: WR_LMK_CLK_IN_N WR_LMK_CLK_IN_P
net class WR_CLK2: WR_LMK_CLK_HF2_N WR_LMK_CLK_HF2_P
net class WR_CLK1: WR_LMK_CLK_HF1_N WR_LMK_CLK_HF1_P
net class RAIL_CLK: CLK_Fanout_In_N CLK_Fanout_In_P
net class PCIE4_SysRef_FPGA: PCIE4_SysRef_FPGA_N PCIE4_SysRef_FPGA_P
net class PCIE3_SysRef_FPGA: PCIE3_SysRef_FPGA_N PCIE3_SysRef_FPGA_P
net class PCIE2_SysRef_FPGA: PCIE2_SysRef_FPGA_N PCIE2_SysRef_FPGA_P
net class PCIE1_SysRef_FPGA: PCIE1_SysRef_FPGA_N PCIE1_SysRef_FPGA_P
net class PCIE0_Sysref_FPGA: PCIE0_SysRef_FPGA_N PCIE0_SysRef_FPGA_P
component class U_Pomiar_pradu_napiecia_1: C309_U_Pomiar_pradu_napiecia_1 R448_U_Pomiar_pradu_napiecia_1 U64_U_Pomiar_pradu_napiecia_1
component class U_Pomiar_pradu_napiecia_2: C309_U_Pomiar_pradu_napiecia_2 R448_U_Pomiar_pradu_napiecia_2 U64_U_Pomiar_pradu_napiecia_2
component class U_Pomiar_pradu_napiecia_3: C309_U_Pomiar_pradu_napiecia_3 R448_U_Pomiar_pradu_napiecia_3 U64_U_Pomiar_pradu_napiecia_3
component class U_Pomiar_pradu_napiecia_4: C309_U_Pomiar_pradu_napiecia_4 R448_U_Pomiar_pradu_napiecia_4 U64_U_Pomiar_pradu_napiecia_4
net class LTC_6952_3_REF: LTC6952_3_REF_N LTC6952_3_REF_P
net class LTC_6952_3_REF_SMA: LTC6952_3_REF_SMA_N LTC6952_3_REF_SMA_P
net class LTC_6952_2_REF: LTC6952_2_REF_N LTC6952_2_REF_P
net class LTC_6952_2_REF_SMA: LTC6952_2_REF_SMA_N LTC6952_2_REF_SMA_P
net class LTC_6952_1_REF: LTC6952_1_REF_N LTC6952_1_REF_P
net class Bank505_MGTRREFx_: CLK_GTR_T1_N CLK_GTR_T1_P CLK_GTR_T2_N CLK_GTR_T2_P CLK_GTR_T3_N CLK_GTR_T3_P
component class DAC: C320 C321 C322 C323 R481 R608 R609 U30 X2 X3
net class Si53323_2_Q2_LVDS: Si53323_2_Q2_LVDS_N Si53323_2_Q2_LVDS_P
net class Si53323_1_Q2_LVDS: Si53323_1_Q2_LVDS_N Si53323_1_Q2_LVDS_P
net class DATA_ETH_TO_PHY: TD_A_N TD_A_P TD_B_N TD_B_P TD_C_N TD_C_P TD_D_N TD_D_P
component class SFP_Group+IMU: R469 R470 R471 R472 R473 R474 R475 R476 R477 R478 R479 R480
component class HighSpeed: R427 R449 R450 R451 R452 R453 R454 R538
component class CLK_MUX: C324 C325 C326 C327 C328 C329 C330 C333 C336 C337 C338 C339 C340 C341 C342 C343 C344 C724 C725 C726 C727 FB23 FB24 J26 R245 R246 R247 R248 R249 R250 R251 R252 R253 R254 R255 R256 R257 R258 R259 R260 R261 R262 R263 R264 R265 R291 R301 R384 R385 R386 R387 R482 R483 R484 R485 R486 R487 R488 R489 T36 U31 U32 U33
net class Si53323_2_Q2: Si53323_2_Q2_N Si53323_2_Q2_P
net class Si53323_2_Q1: Si53323_2_Q1_N Si53323_2_Q1_P
net class Si53323_2_CLK1: Si53323_2_CLK1_N Si53323_2_CLK1_P
net class Si53323_1_Q2: Si53323_1_Q2_N Si53323_1_Q2_P
net class Si53323_1_Q1: Si53323_1_Q1_N Si53323_1_Q1_P
net class RefClk_Si53323: RefClk_Si53323_N RefClk_Si53323_P
net class MUX_DIV_OUT: OSC_Out_DIV_N OSC_Out_DIV_P
net class MUX_DIV_OUT_I: Osc_in_Si53323_2_N Osc_in_Si53323_2_P
net class CLM_M_OSC_IN_C: OSC_500Out
net class CLK_SMA_2: CLK_SMA2_N CLK_SMA2_P
net class CLK_SMA_1: CLK_SMA1_N CLK_SMA1_P
net class CLK_SMA_0: CLK_SMA0_N CLK_SMA0_P
net class CLK_SMA2_C: CLK_SMA2_C_N CLK_SMA2_C_P
net class CLK_SMA1_C: CLK_SMA1_C_N CLK_SMA1_C_P
net class CLK_SMA0_C: CLK_SMA0_C_N CLK_SMA0_C_P
net class CLK_M_OSC_In: CLK_M_OSC_In
differential pair class Diff_76_to_90_Ram_DQS: DDR4_DQS_0 DDR4_DQS_1 DDR4_DQS_2 DDR4_DQS_3 DDR4_DQS_4 DDR4_DQS_5 DDR4_DQS_6 DDR4_DQS_7 DDR4_DQS_8
net class Single_36_39_50_Adr: DDR4_A0 DDR4_A1 DDR4_A2 DDR4_A3 DDR4_A4 DDR4_A5 DDR4_A6 DDR4_A7 DDR4_A8 DDR4_A9 DDR4_A10 DDR4_A11 DDR4_A12 DDR4_A13 DDR4_ACT_N DDR4_BA0 DDR4_BA1 DDR4_BG0 DDR4_CAS DDR4_CKE0 DDR4_CS_B DDR4_DQS_ODT0 DDR4_PARITY DDR4_RAM_RST_N DDR4_RAS DDR4_WE
net class Diff_76_86_90: DDR4_DQS_0_N DDR4_DQS_0_P DDR4_DQS_1_N DDR4_DQS_1_P DDR4_DQS_2_N DDR4_DQS_2_P DDR4_DQS_3_N DDR4_DQS_3_P DDR4_DQS_4_N DDR4_DQS_4_P DDR4_DQS_5_N DDR4_DQS_5_P DDR4_DQS_6_N DDR4_DQS_6_P DDR4_DQS_7_N DDR4_DQS_7_P DDR4_DQS_8_N DDR4_DQS_8_P
net class RAM_Clock_Signal: DDR4_CK_N DDR4_CK_P
component class U_Pomiar_pradu_napiecia_5: C309_U_Pomiar_pradu_napiecia_5 R448_U_Pomiar_pradu_napiecia_5 U64_U_Pomiar_pradu_napiecia_5
component class U_Pomiar_pradu_napiecia_6: C309_U_Pomiar_pradu_napiecia_6 R448_U_Pomiar_pradu_napiecia_6 U64_U_Pomiar_pradu_napiecia_6
component class U_Pomiar_pradu_napiecia_7: C309_U_Pomiar_pradu_napiecia_7 R448_U_Pomiar_pradu_napiecia_7 U64_U_Pomiar_pradu_napiecia_7
component class U_Pomiar_pradu_napiecia_8: C309_U_Pomiar_pradu_napiecia_8 R448_U_Pomiar_pradu_napiecia_8 U64_U_Pomiar_pradu_napiecia_8
component class U_Pomiar_pradu_napiecia_9: C309_U_Pomiar_pradu_napiecia_9 R448_U_Pomiar_pradu_napiecia_9 U64_U_Pomiar_pradu_napiecia_9
component class U_5V_to_3V31: C563_U_5V_to_3V31 C564_U_5V_to_3V31 C565_U_5V_to_3V31 C566_U_5V_to_3V31 C567_U_5V_to_3V31 R430_U_5V_to_3V31 R431_U_5V_to_3V31 R432_U_5V_to_3V31 U59_U_5V_to_3V31
channel class Pomiar_pradu_napiecia: U_Pomiar_pradu_napiecia_10 U_Pomiar_pradu_napiecia_11
net class Single_39_50_D: DDR4_DM0 DDR4_DM1 DDR4_DM2 DDR4_DM3 DDR4_DM4 DDR4_DM5 DDR4_DM6 DDR4_DM7 DDR4_DQ0 DDR4_DQ1 DDR4_DQ2 DDR4_DQ3 DDR4_DQ4 DDR4_DQ5 DDR4_DQ6 DDR4_DQ7 DDR4_DQ8 DDR4_DQ9 DDR4_DQ10 DDR4_DQ11 DDR4_DQ12 DDR4_DQ13 DDR4_DQ14 DDR4_DQ15 DDR4_DQ16 DDR4_DQ17 DDR4_DQ18 DDR4_DQ19 DDR4_DQ20 DDR4_DQ21 DDR4_DQ22 DDR4_DQ23 DDR4_DQ24 DDR4_DQ25 DDR4_DQ26 DDR4_DQ27 DDR4_DQ28 DDR4_DQ29 DDR4_DQ30 DDR4_DQ31 DDR4_DQ32 DDR4_DQ33 DDR4_DQ34 DDR4_DQ35 DDR4_DQ36 DDR4_DQ37 DDR4_DQ38 DDR4_DQ39 DDR4_DQ40 DDR4_DQ41 DDR4_DQ42 DDR4_DQ43 DDR4_DQ44 DDR4_DQ45 DDR4_DQ46 DDR4_DQ47 DDR4_DQ48 DDR4_DQ49 DDR4_DQ50 DDR4_DQ51 DDR4_DQ52 DDR4_DQ53 DDR4_DQ54 DDR4_DQ55 DDR4_DQ56 DDR4_DQ57 DDR4_DQ58 DDR4_DQ59 DDR4_DQ60 DDR4_DQ61 DDR4_DQ62 DDR4_DQ63
component class "Xilinx FPGA": R124 R363 R364 R365 R395 R398 R506 R507 R514 R515 R522 R523 R530 R531 R546 R547 R548 R549 R550 R551 R552 R553 R554 R555 R556 R557 R607 R618 R659 R660 R661 R662 R663 R664 R688 R735 R736 R744 R765 R766 R767 R817 R818 R819 R820 R821 R822 R823 R824 TP43 TP44 TP45 TP46 TP47 TP48 TP49 U15
component class U_Pomiar_pradu_napiecia_10: C309_U_Pomiar_pradu_napiecia_10 R448_U_Pomiar_pradu_napiecia_10 U64_U_Pomiar_pradu_napiecia_10
component class U_Pomiar_pradu_napiecia_11: C309_U_Pomiar_pradu_napiecia_11 R448_U_Pomiar_pradu_napiecia_11 U64_U_Pomiar_pradu_napiecia_11
component class PowerDistribition: P7 P8 P9 P10 P11 R229 R230 R455 R456 R457 R458 R459 R460 R461 R462 R463 R464 R465 R466 R467 R468 R593 R594 R595 R596 R597 R598 TP91 TP92
net class USB3._to_C: USB_RX_C_N USB_RX_C_P USB_TX_C_N USB_TX_C_P
net class USB3._C_to_FPGA: USB_RX_N USB_RX_P USB_TX_N USB_TX_P
net class Single_50: CLK_Fanout_In_N CLK_Fanout_In_P CLK_GTR_T1_N CLK_GTR_T1_P CLK_GTR_T2_N CLK_GTR_T2_P CLK_GTR_T3_N CLK_GTR_T3_P CLK_Hi_Rail1_N CLK_Hi_Rail1_P CLK_Hi_Rail1_SysRef_N CLK_Hi_Rail1_SysRef_P CLK_Hi_Rail2_N CLK_Hi_Rail2_P CLK_Hi_Rail2_SysRef_N CLK_Hi_Rail2_SysRef_P CLK_M_OSC_In CLK_NVME_Conn_N CLK_NVME_Conn_P CLK_Q223_T1_N CLK_Q223_T1_P CLK_Q224_T1_N CLK_Q224_T1_P CLK_Q225_T1_N CLK_Q225_T1_P CLK_Q226_T1_N CLK_Q226_T1_P CLK_SMA0_C_N CLK_SMA0_C_P CLK_SMA0_N CLK_SMA0_P CLK_SMA1_C_N CLK_SMA1_C_P CLK_SMA1_N CLK_SMA1_P CLK_SMA2_C_N CLK_SMA2_C_P CLK_SMA2_N CLK_SMA2_P LTC6952_1_REF_N LTC6952_1_REF_P LTC6952_1_VCO_N LTC6952_1_VCO_P LTC6952_2_REF_N LTC6952_2_REF_P LTC6952_2_REF_SMA_N LTC6952_2_REF_SMA_P LTC6952_3_REF_N LTC6952_3_REF_P LTC6952_3_REF_SMA_N LTC6952_3_REF_SMA_P NetC334_1 NetC335_2 NetC341_1 NetC588_1 NetC588_2 NetR543_1 NVME_C_RX_1_N NVME_C_RX_1_P NVME_C_RX_O_N NVME_C_RX_O_P NVME_C_TX_1_N NVME_C_TX_1_P NVME_C_TX_O_N NVME_C_TX_O_P NVMe_Rx_0_N NVMe_Rx_0_P NVMe_Rx_1_N NVMe_Rx_1_P NVMe_Tx_0_N NVMe_Tx_0_P NVMe_Tx_1_N NVMe_Tx_1_P OSC_500Out Osc_in_Si53323_2_N Osc_in_Si53323_2_P OSC_Out_DIV_N OSC_Out_DIV_P PCIE0_SysRef_FPGA_N PCIE0_SysRef_FPGA_P PCIE1_SysRef_FPGA_N PCIE1_SysRef_FPGA_P PCIE2_SysRef_FPGA_N PCIE2_SysRef_FPGA_P PCIE3_SysRef_FPGA_N PCIE3_SysRef_FPGA_P PCIE4_SysRef_FPGA_N PCIE4_SysRef_FPGA_P RefClk_Si53323_N RefClk_Si53323_P SGMI_C_Rx_N SGMI_C_Rx_P SGMI_C_Tx_N SGMI_C_Tx_P SGMI_Rx_N SGMI_Rx_P SGMI_Tx_N SGMI_Tx_P Si53323_1_Q1_N Si53323_1_Q1_P Si53323_1_Q2_LVDS_N Si53323_1_Q2_LVDS_P Si53323_1_Q2_N Si53323_1_Q2_P Si53323_2_CLK1_N Si53323_2_CLK1_P Si53323_2_Q1_N Si53323_2_Q1_P Si53323_2_Q2_LVDS_N Si53323_2_Q2_LVDS_P Si53323_2_Q2_N Si53323_2_Q2_P TD_A_N TD_A_P TD_B_N TD_B_P TD_C_N TD_C_P TD_D_N TD_D_P WR_LMK_CLK_HF1_N WR_LMK_CLK_HF1_P WR_LMK_CLK_HF2_N WR_LMK_CLK_HF2_P WR_LMK_CLK_IN_N WR_LMK_CLK_IN_P WR_Source_CLK_N WR_Source_CLK_P XO_LMK05028_P
net class Singe_50: Bank505_MGTRREF0_C_N Bank505_MGTRREF0_C_P Bank505_MGTRREF2_C_N Bank505_MGTRREF2_C_P Bank505_MGTRREF3_C_N Bank505_MGTRREF3_C_P NetU2_L25 NetU2_L26
net class NVMe_REFCLK: CLK_NVME_Conn_N CLK_NVME_Conn_P
net class NVMe_DATA: NVMe_Rx_0_N NVMe_Rx_0_P NVMe_Rx_1_N NVMe_Rx_1_P NVMe_Tx_0_N NVMe_Tx_0_P NVMe_Tx_1_N NVMe_Tx_1_P
net class Bank505_MGTRREFx_C: Bank505_MGTRREF0_C_N Bank505_MGTRREF0_C_P Bank505_MGTRREF2_C_N Bank505_MGTRREF2_C_P Bank505_MGTRREF3_C_N Bank505_MGTRREF3_C_P NetU2_L25 NetU2_L26
net class Bank226_MGTREFx_to_C: CLK_Q226_T1_N CLK_Q226_T1_P